# Altium PCB Baseboard-v2.0.PcbDoc (part 1 of 7)
Units mil, origin at the board's own origin, x right, y up, seen from the top; angles counter-clockwise.
Board outline 4488.19 x 3937 mil, 4 copper layers (Top Layer, Ground, Power + Signal, Bottom Layer), stack 61.81 mil thick; 219 components, 194 nets, 891 pads, 449 vias.
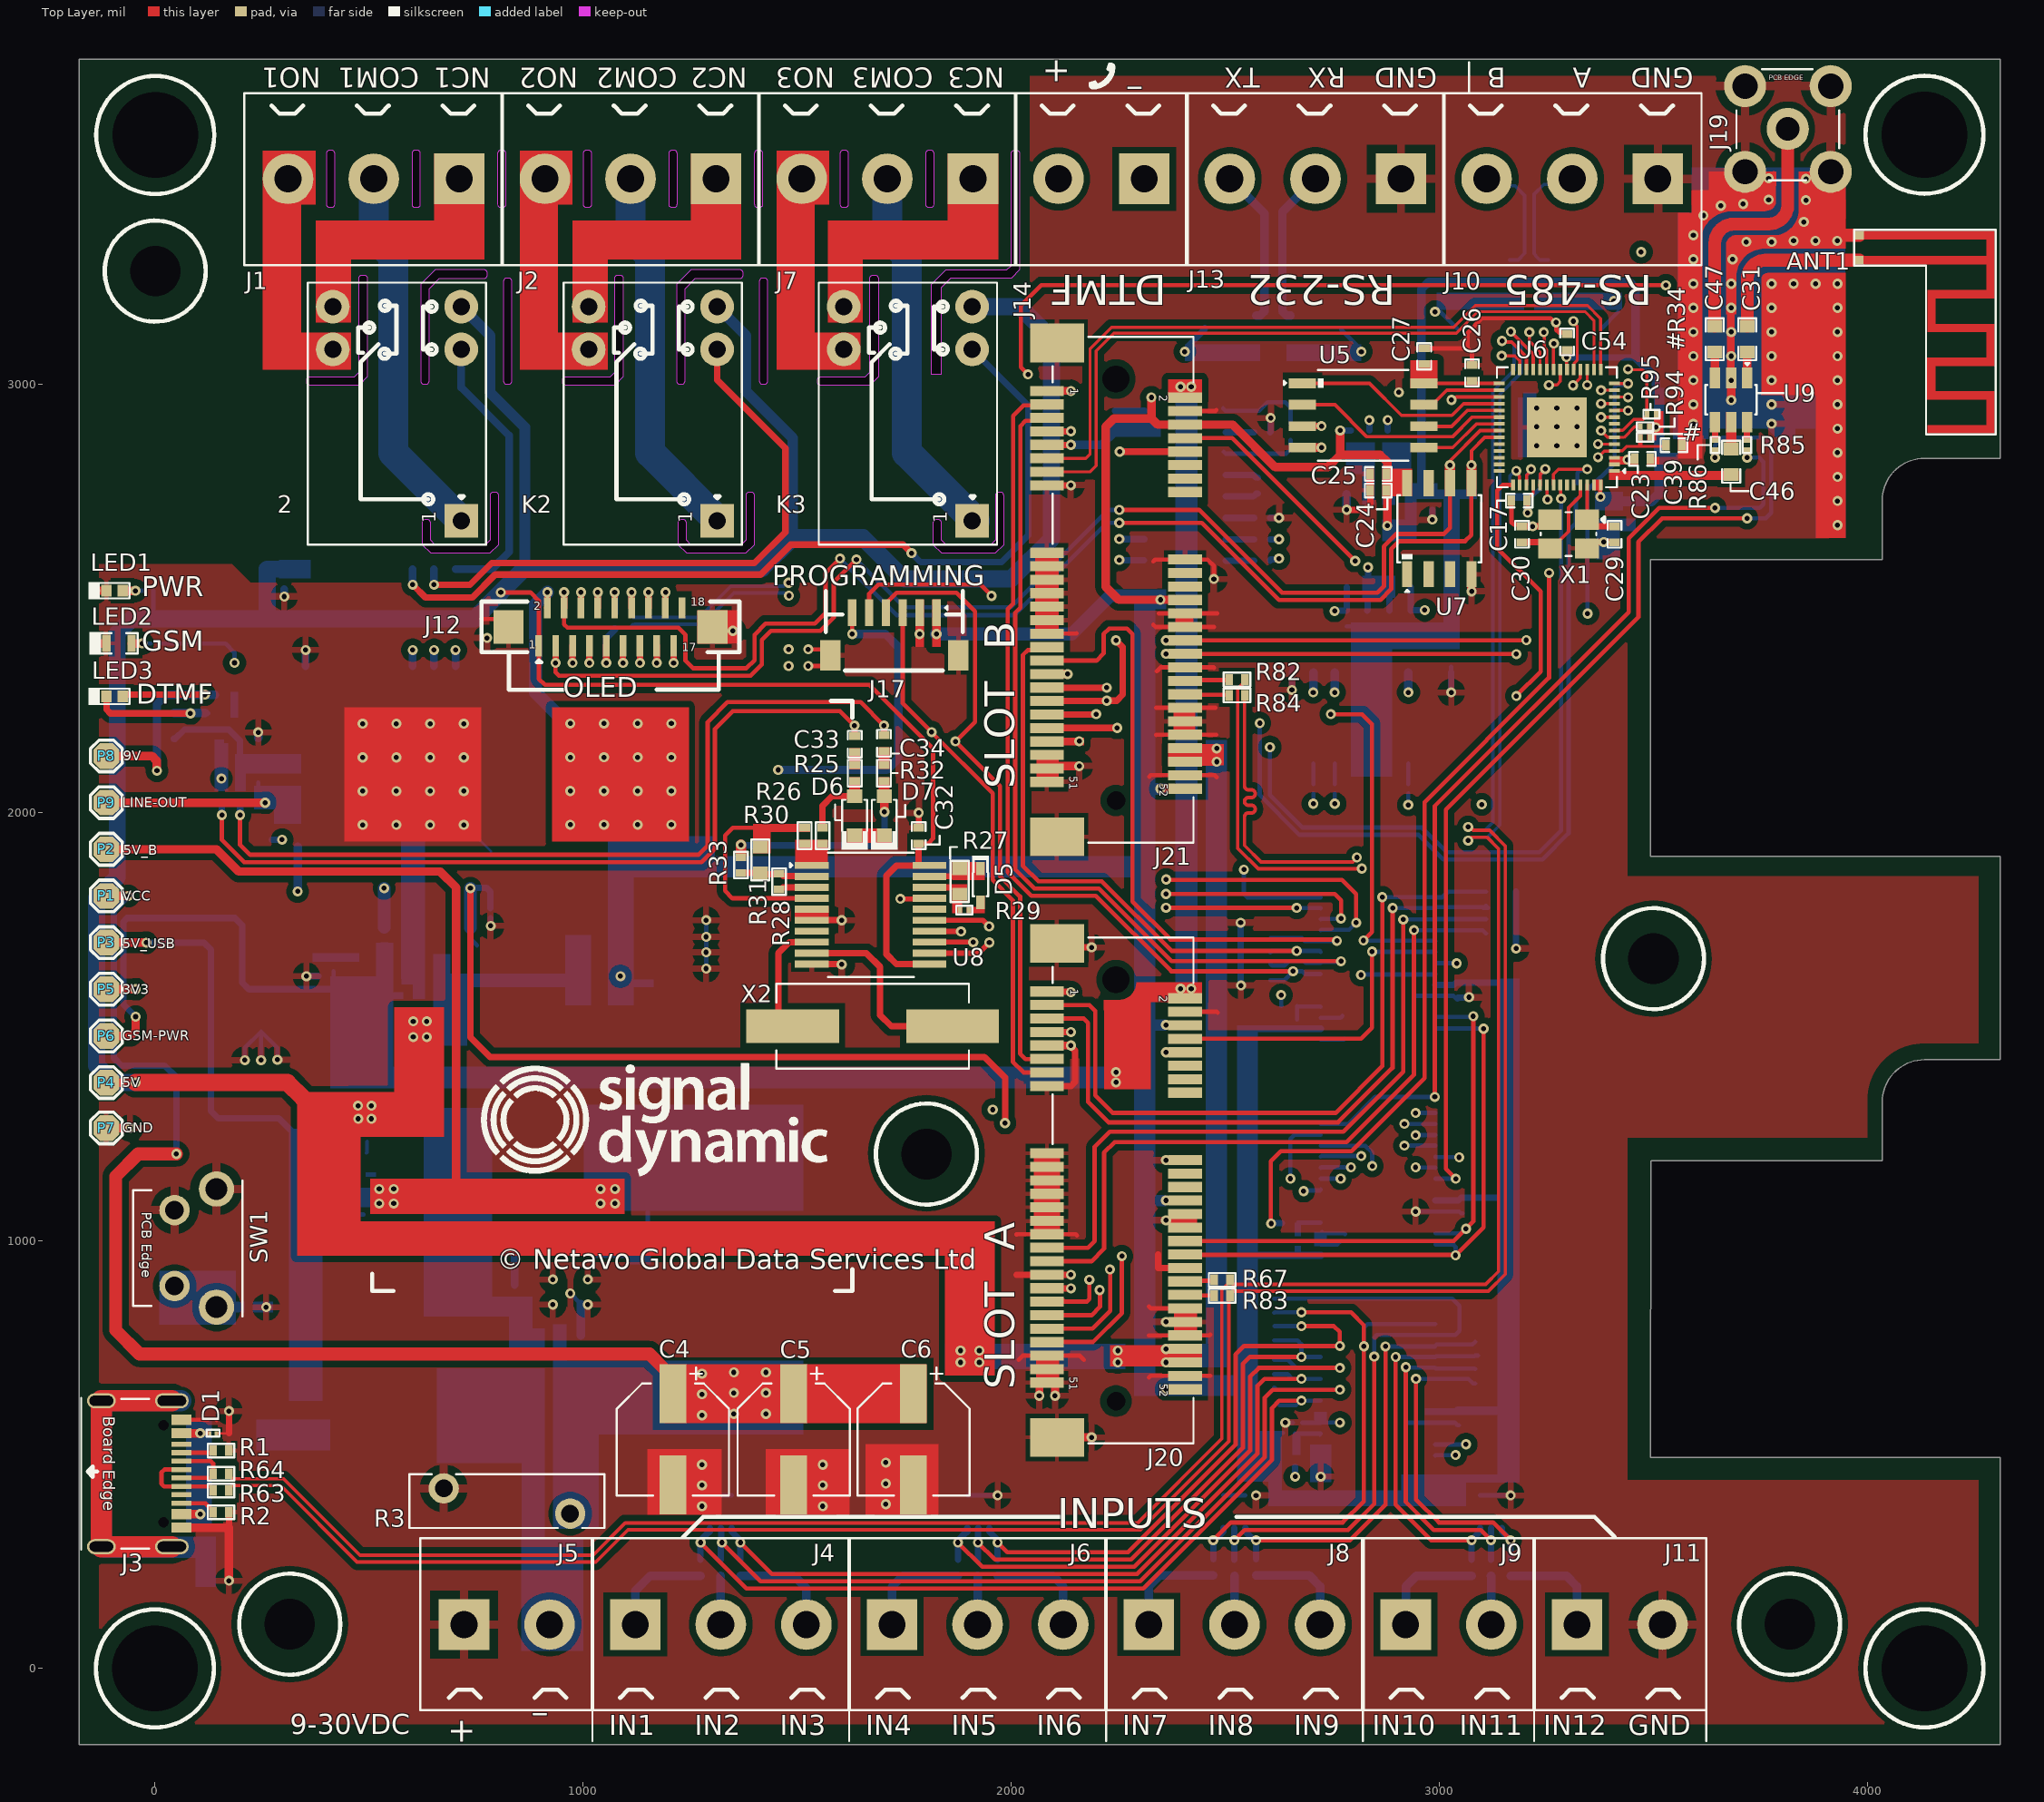
[diagram p0: Top Layer view]
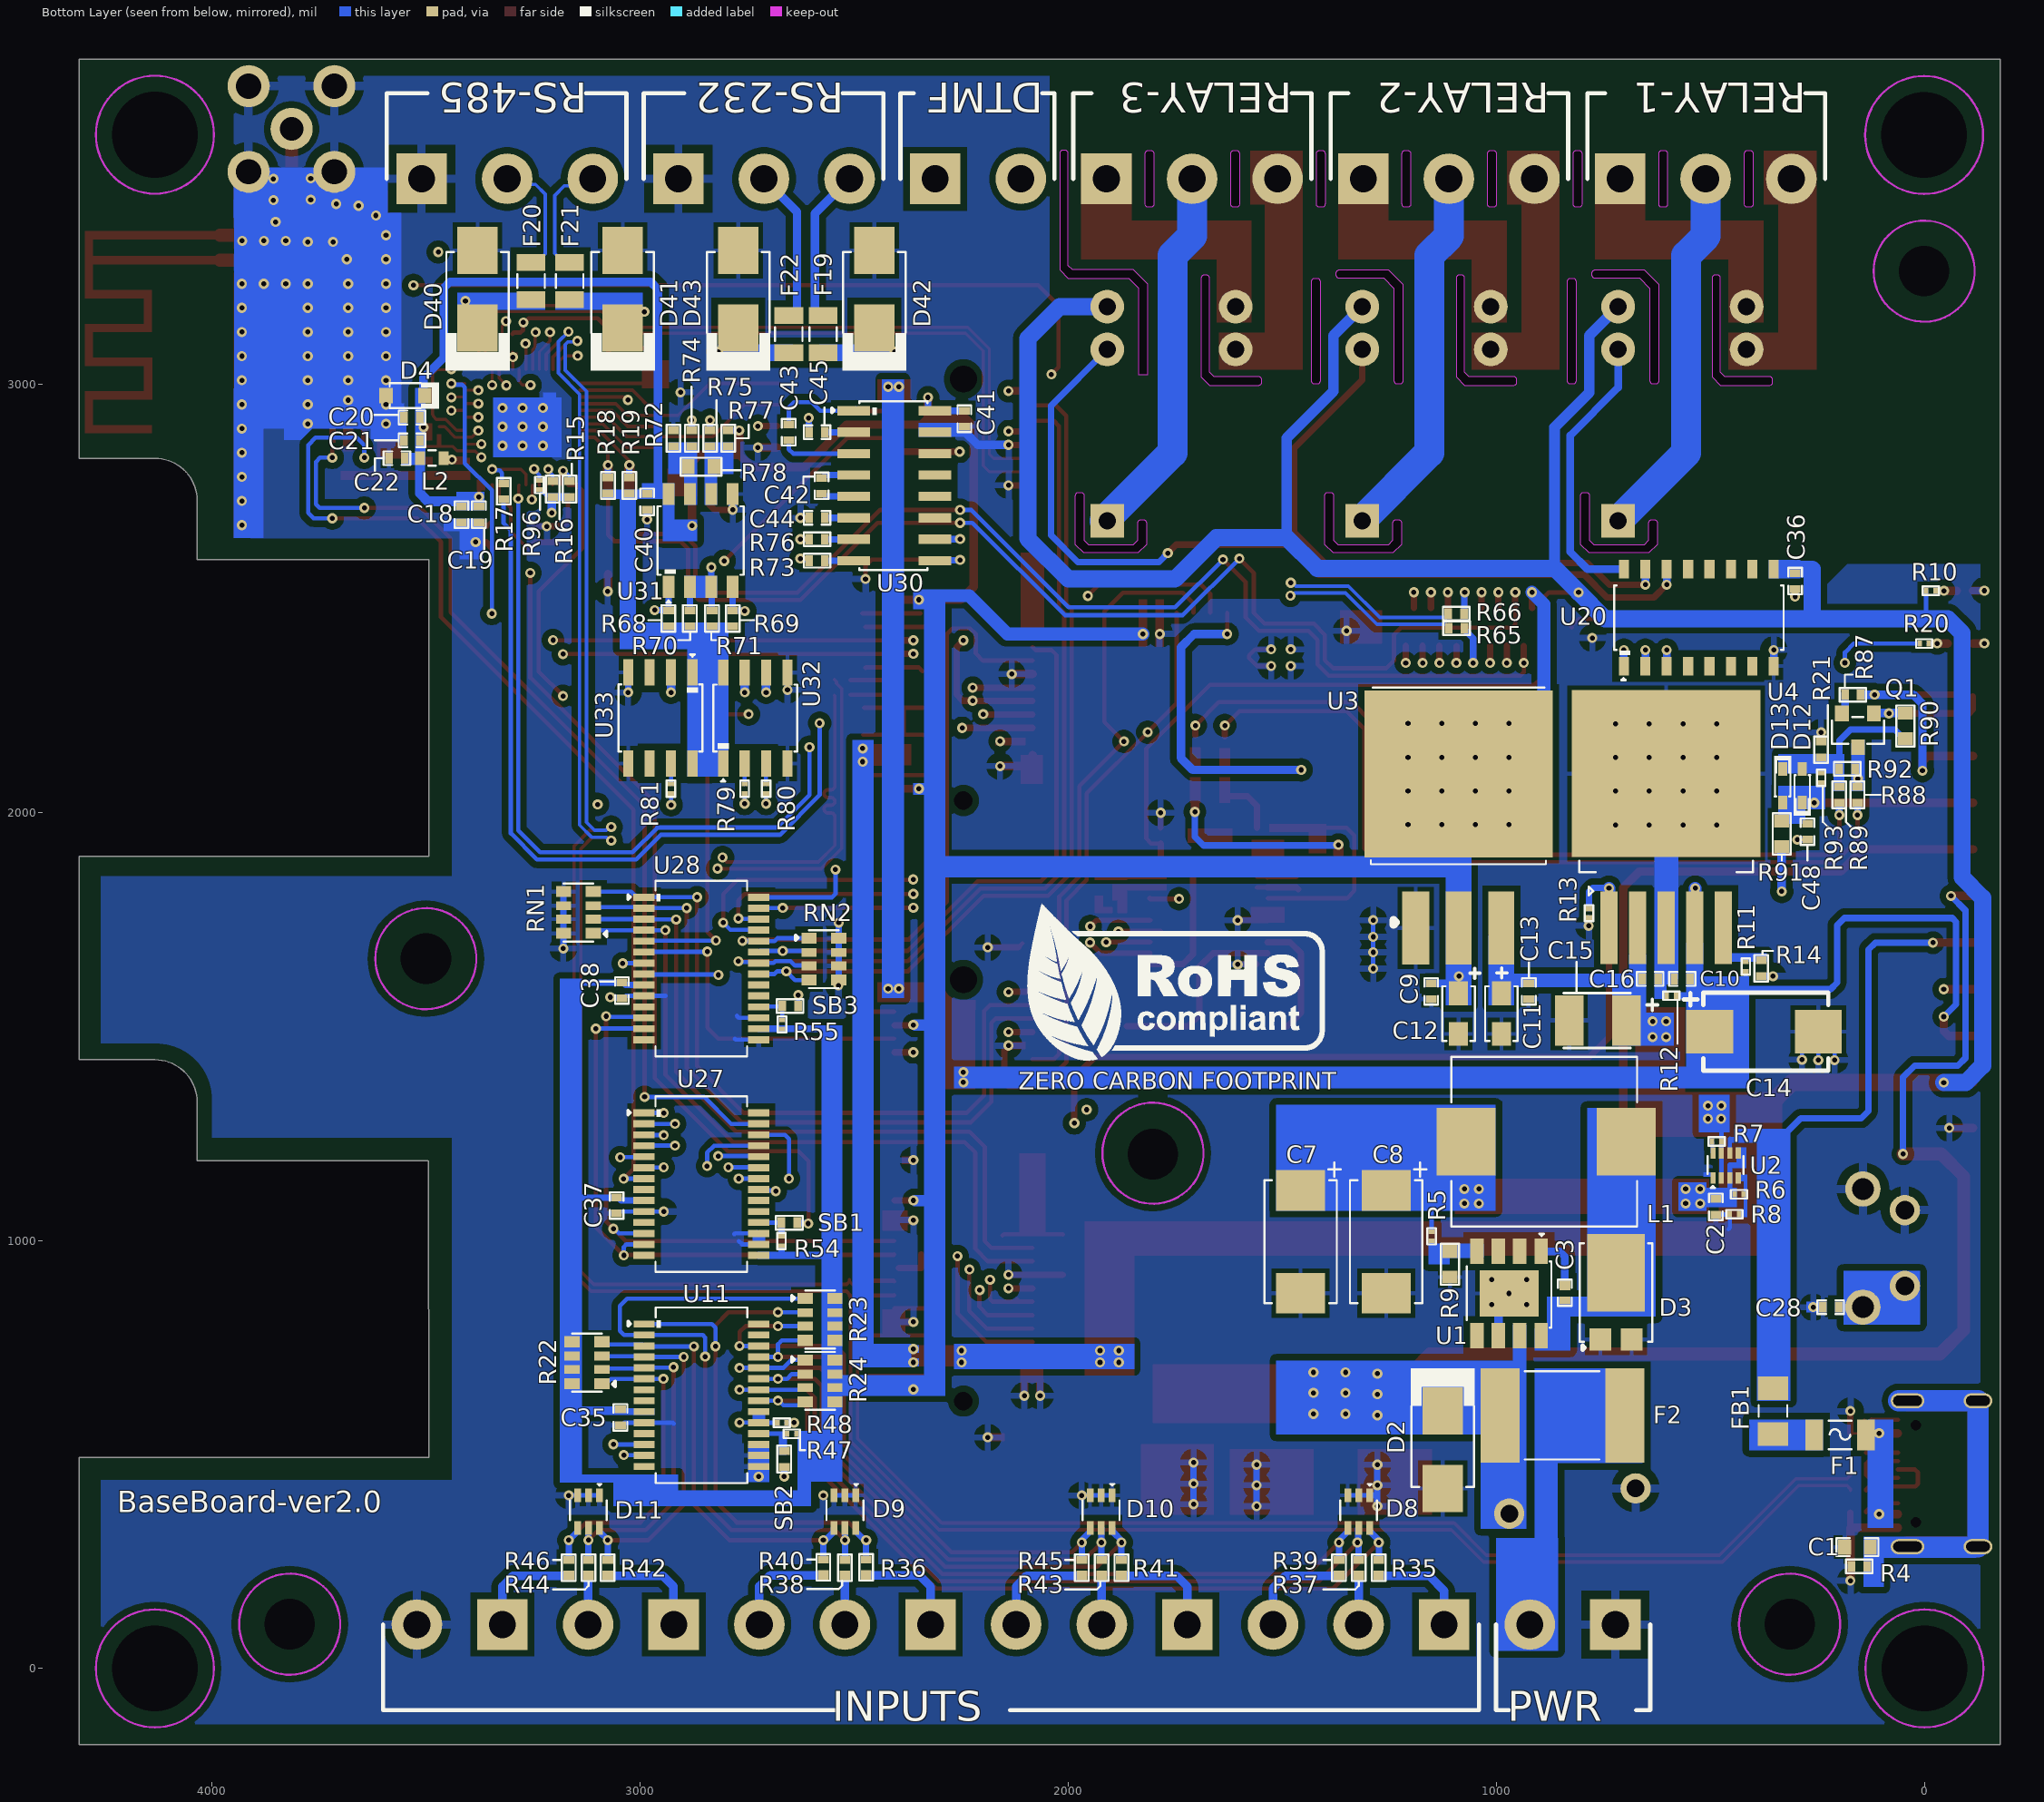
[diagram p1: Bottom Layer view, seen from below]
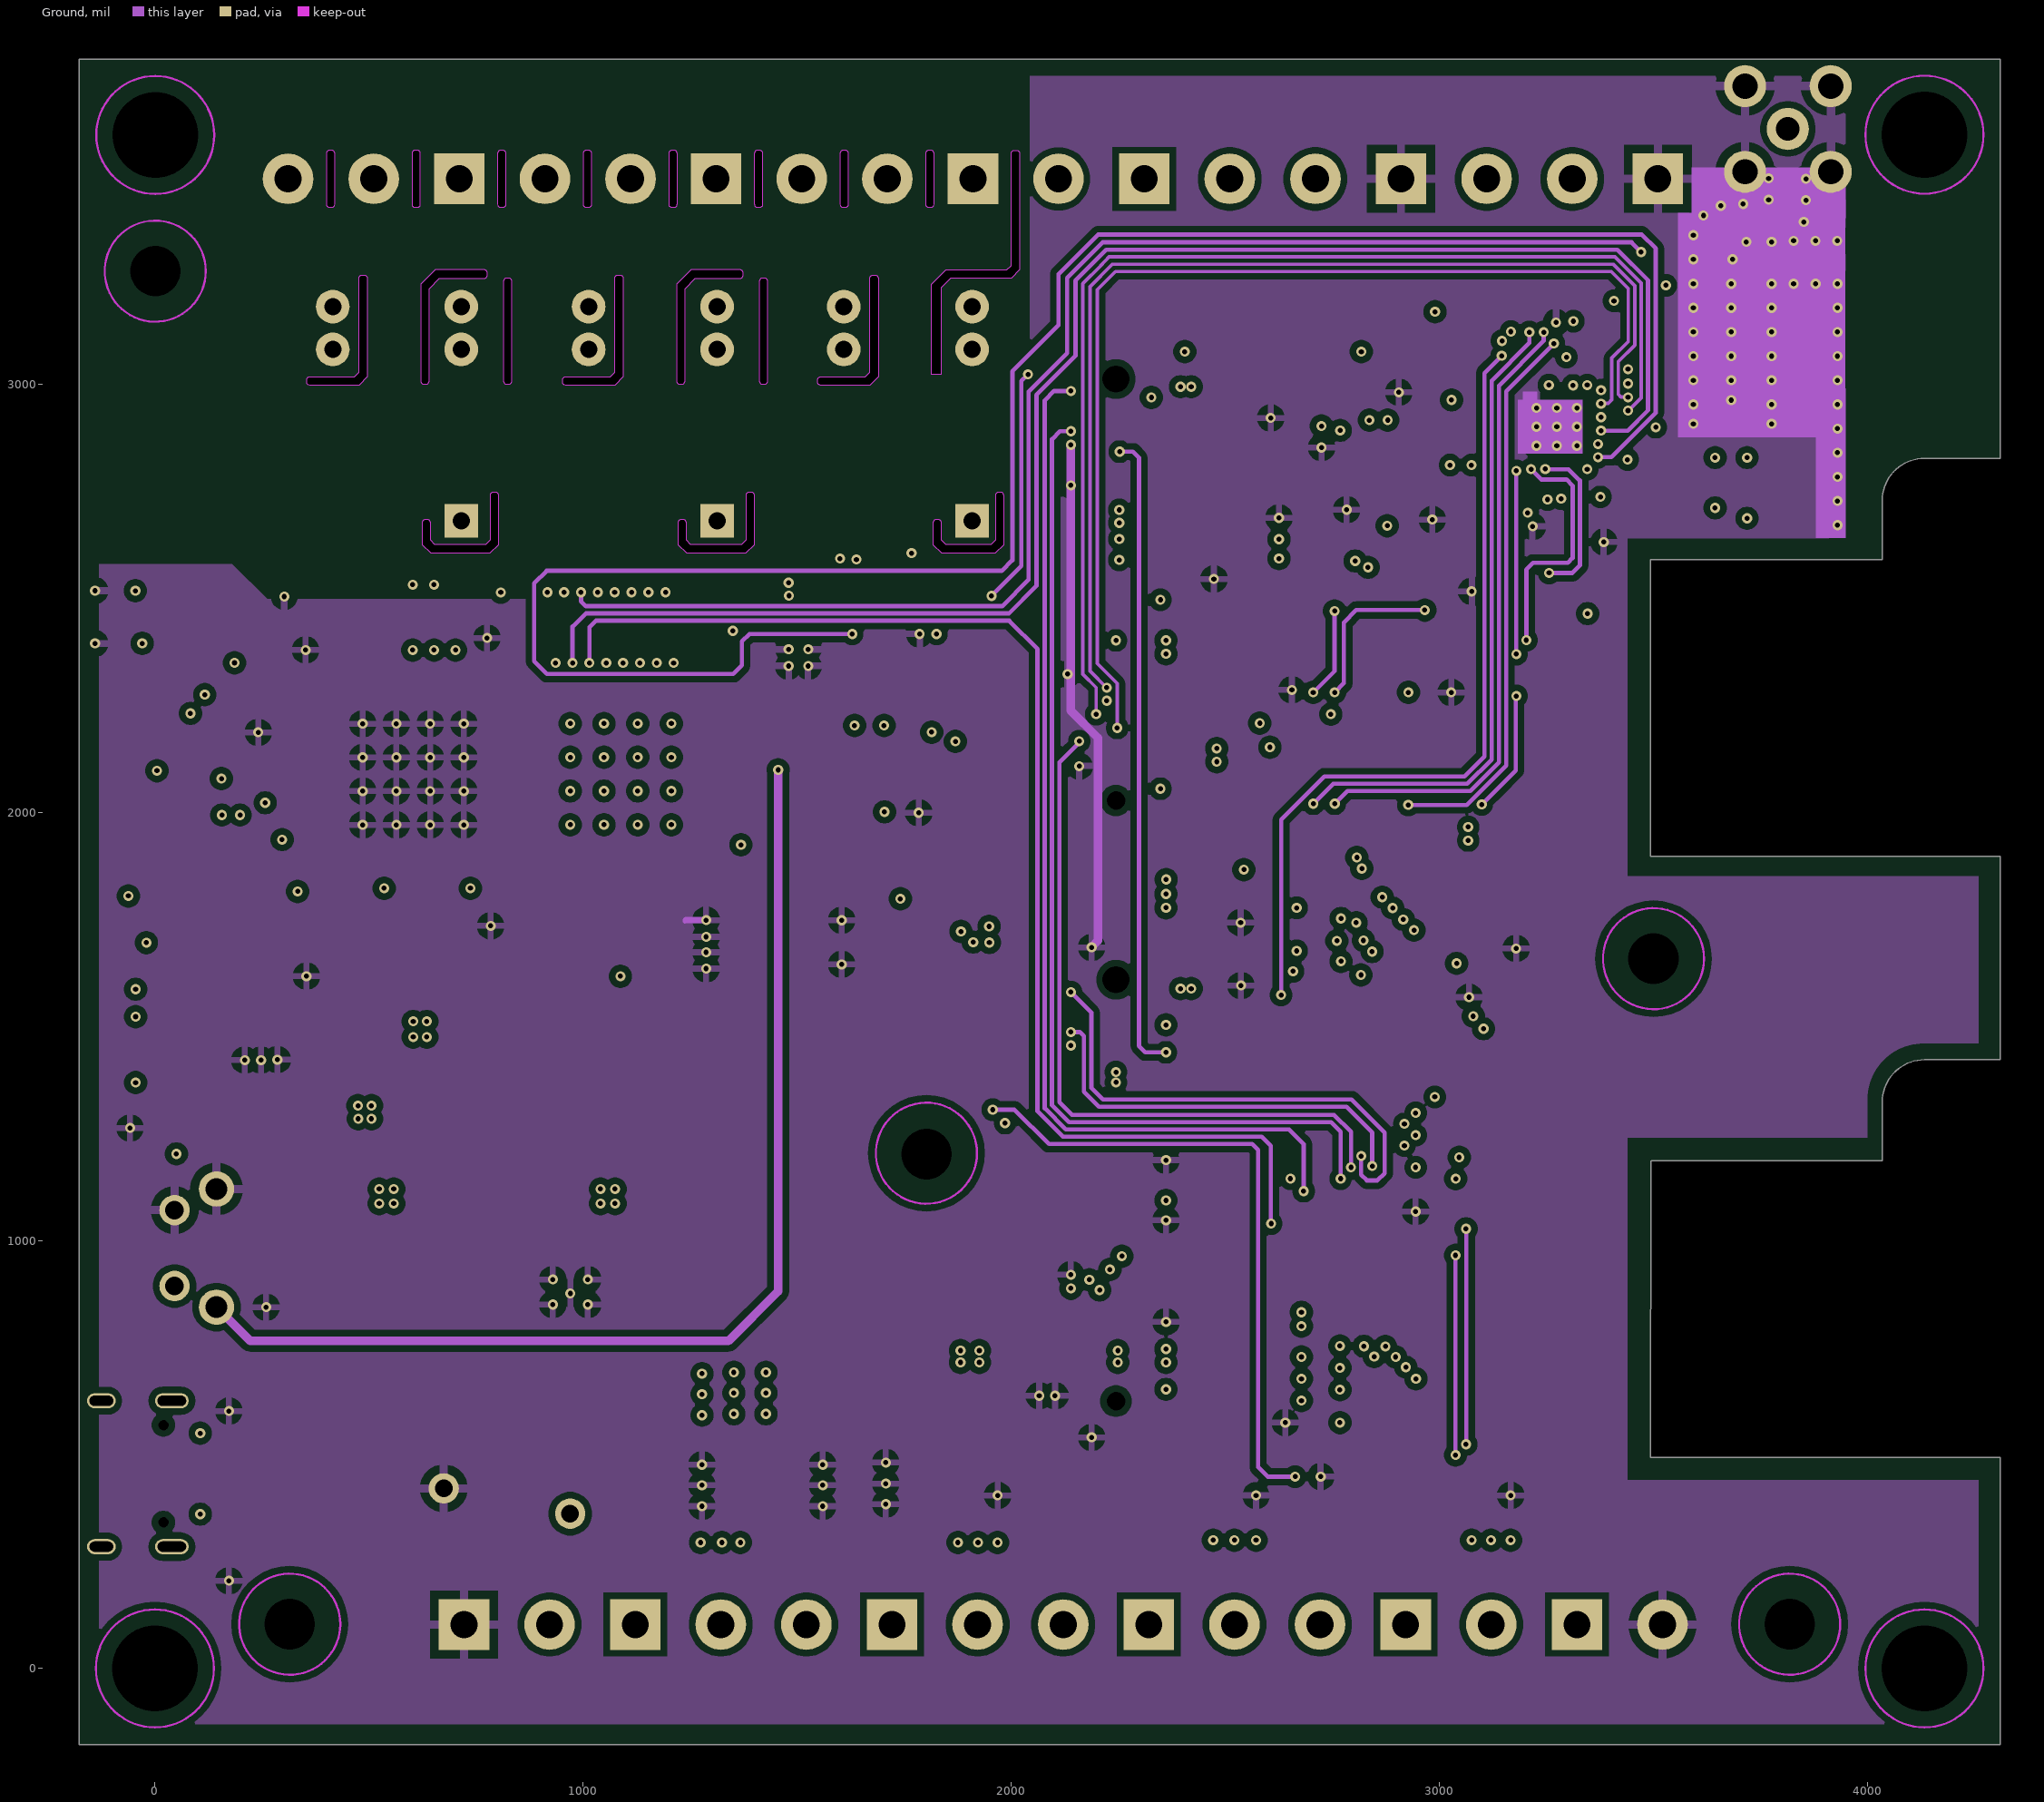
[diagram p2: Ground]
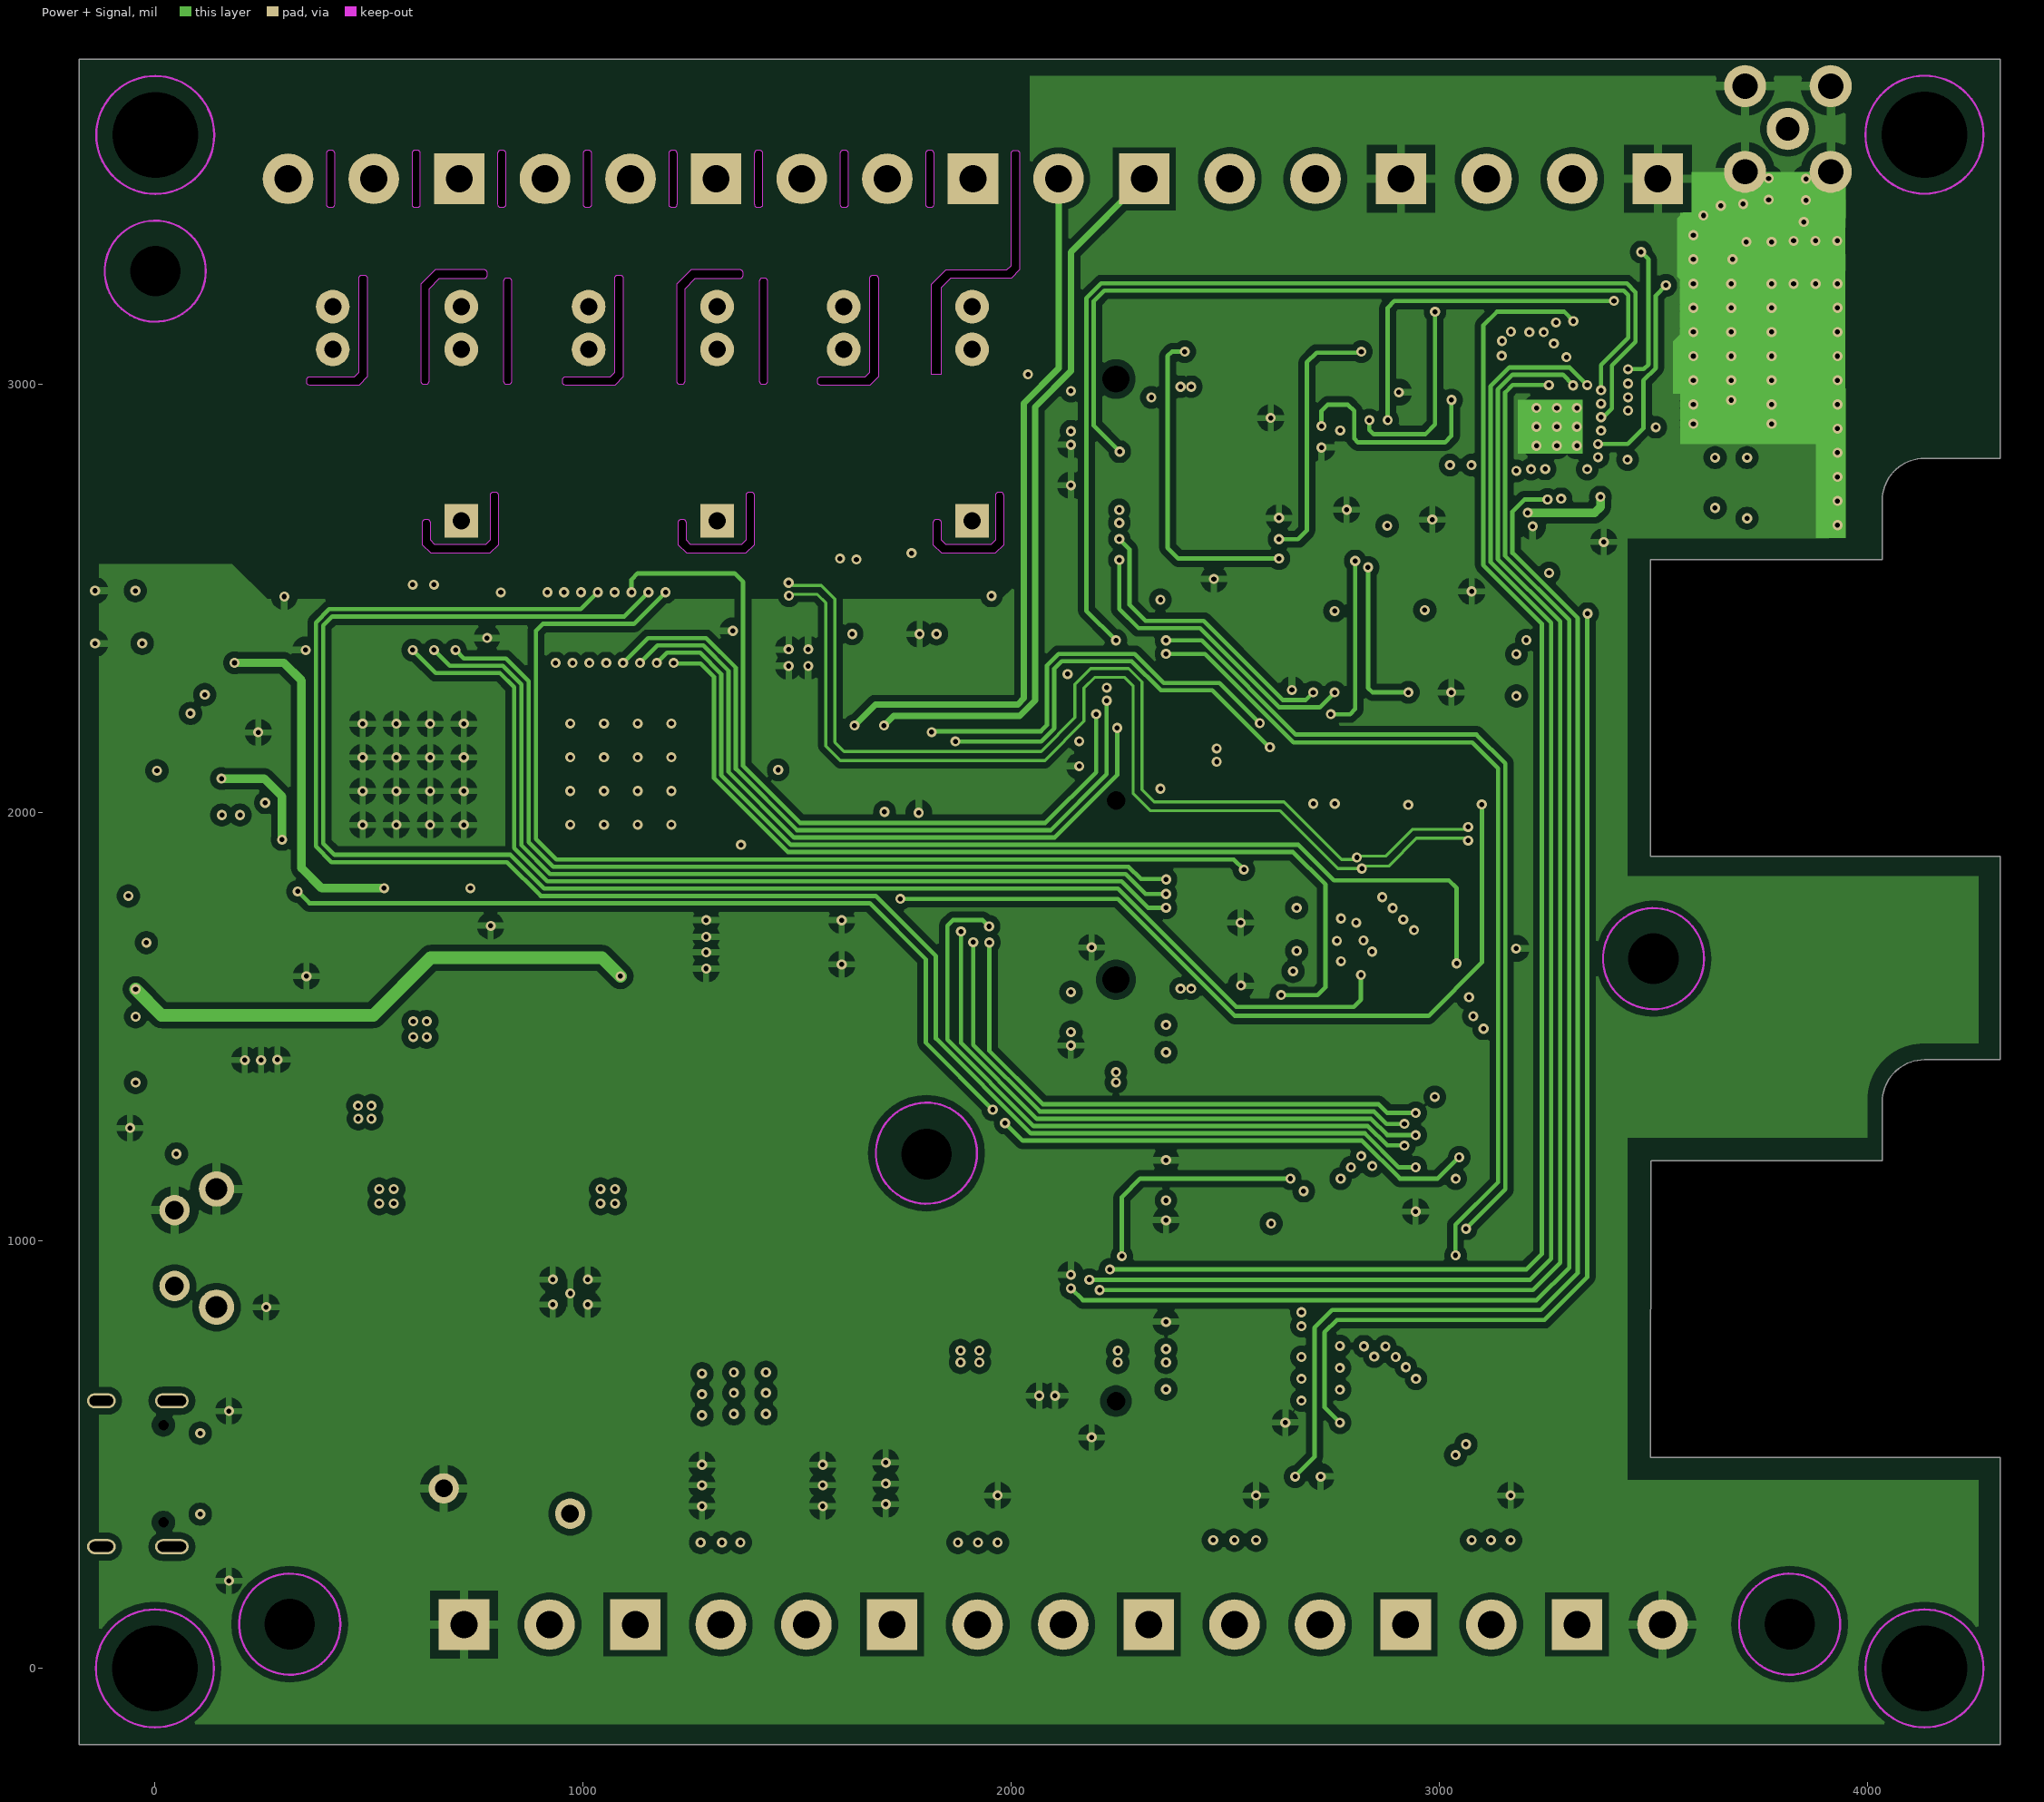
[diagram p3: Power + Signal]
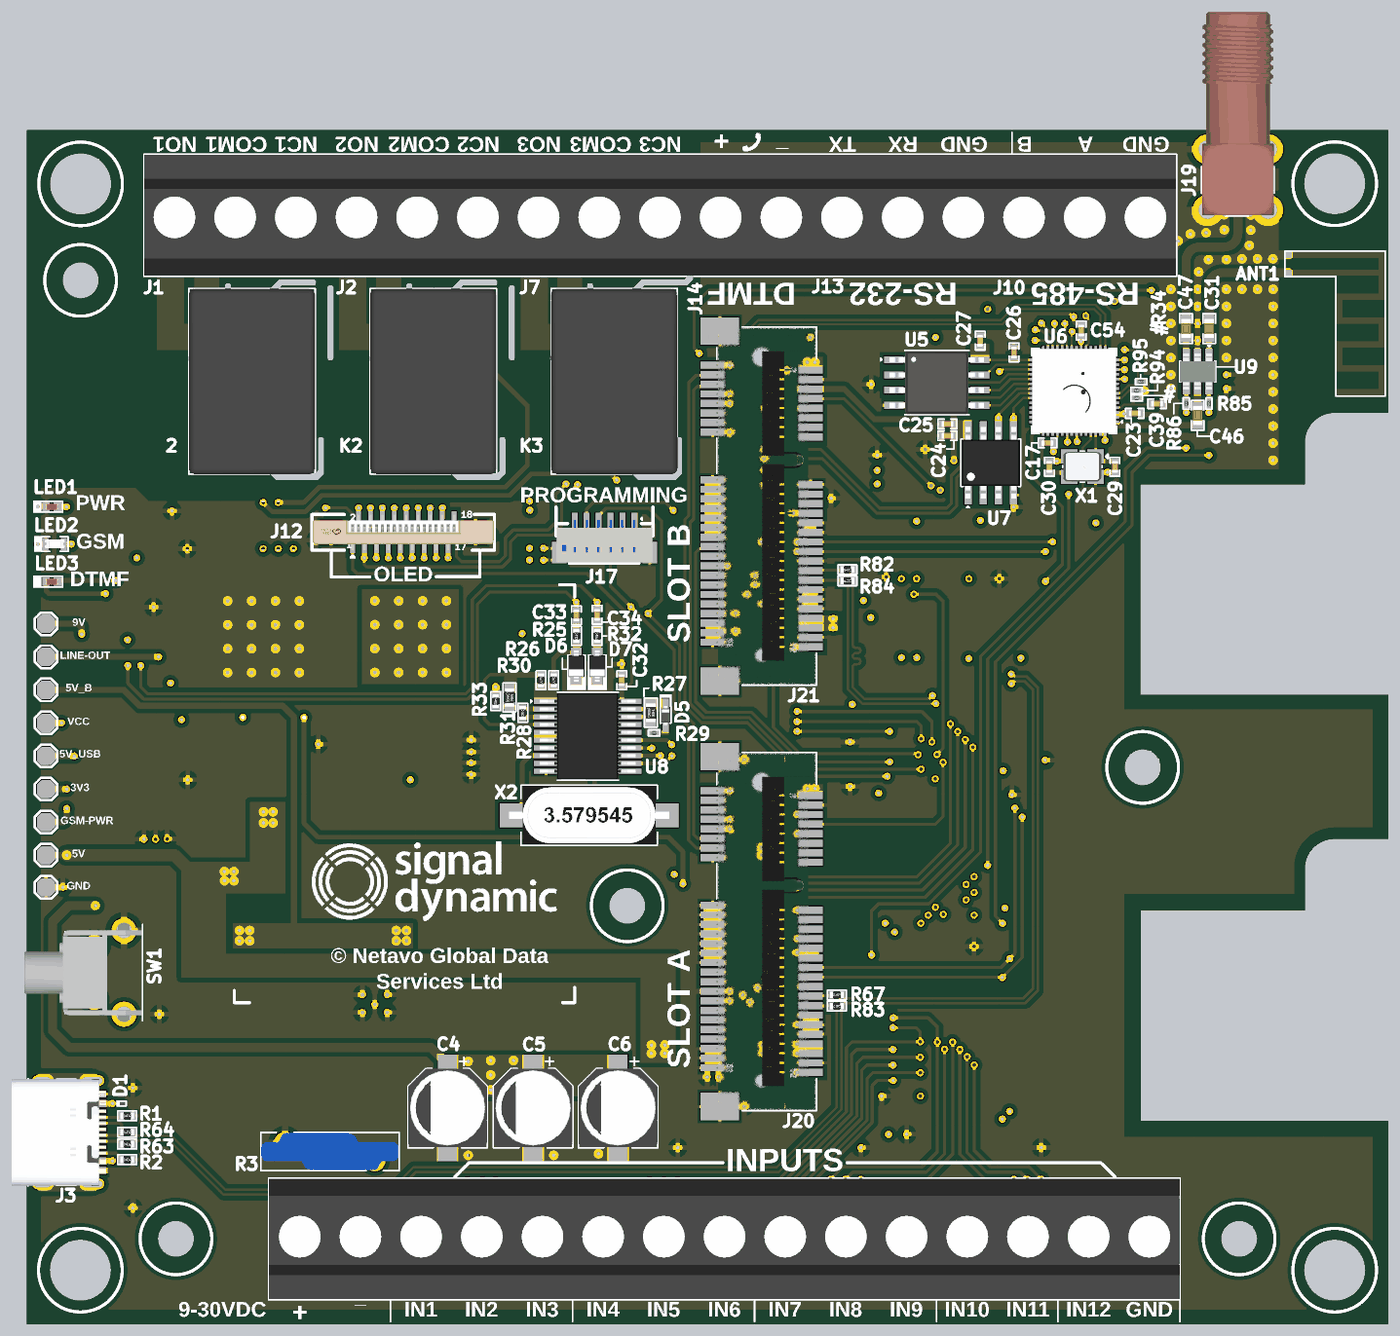
[diagram p7: 3D render of the assembled board from above, using the file's embedded part models]
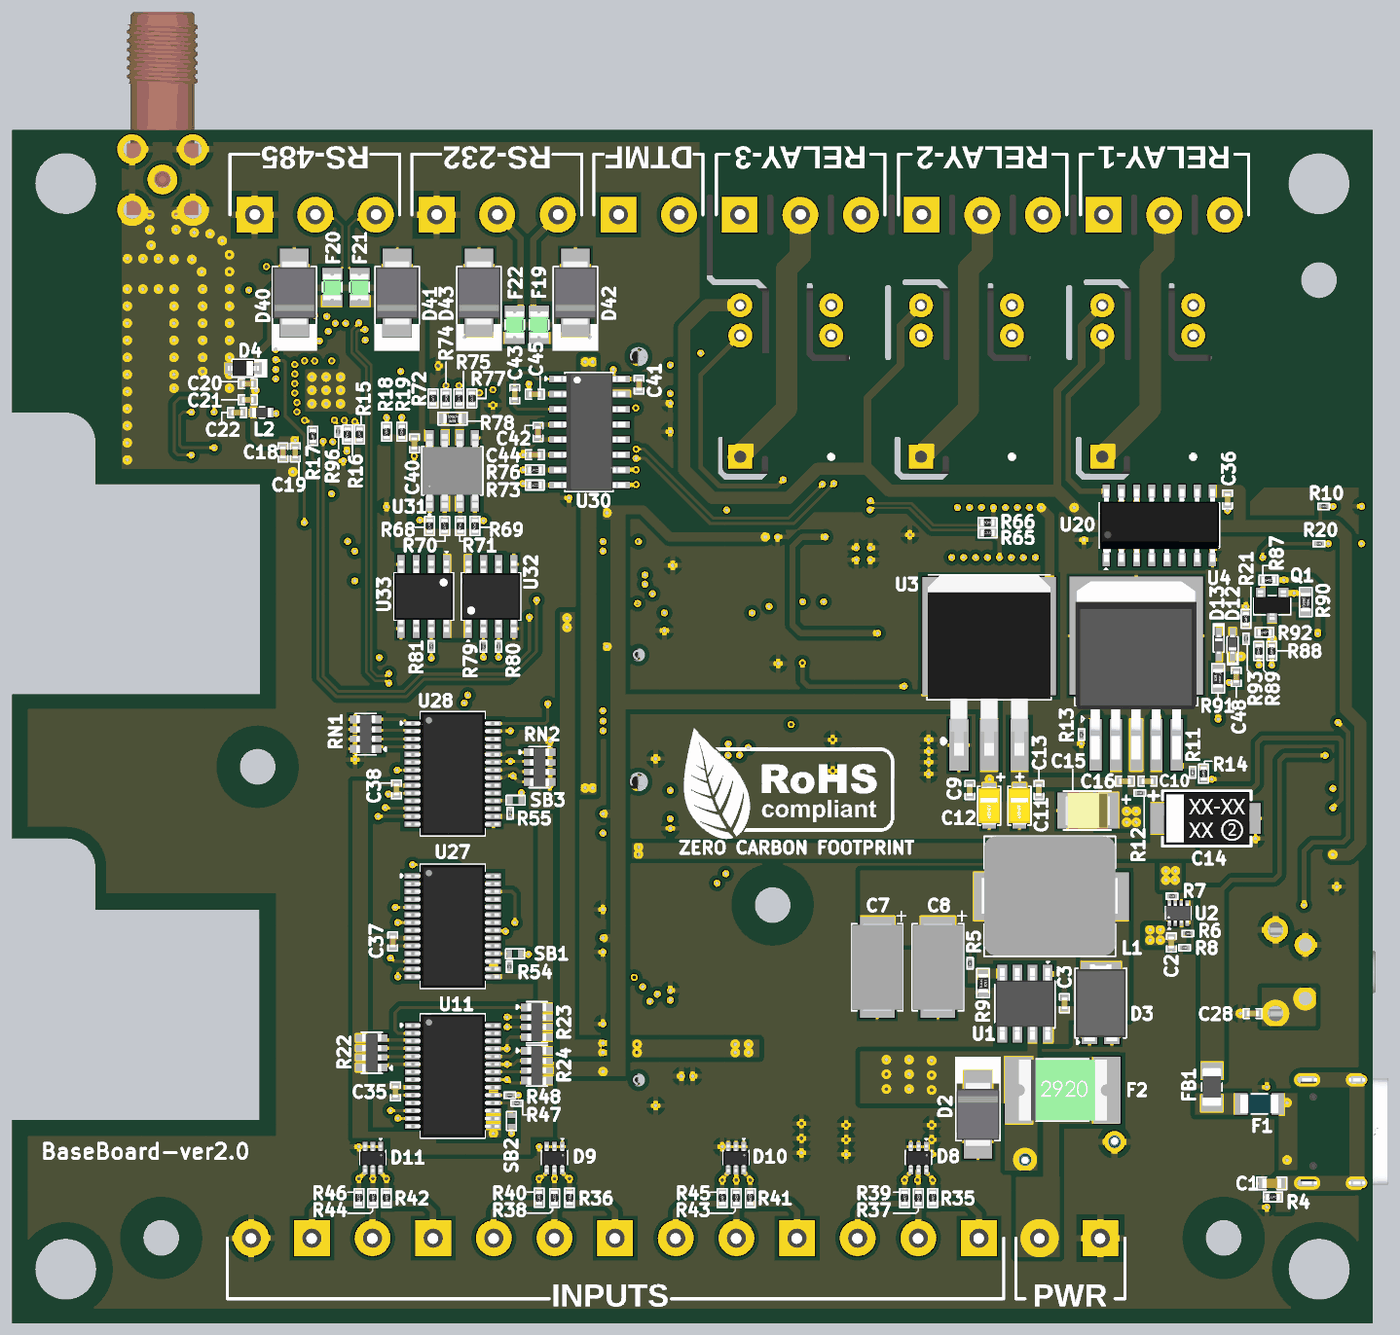
[diagram p8: 3D render of the assembled board from below, using the file's embedded part models]

## Layer stack, top to bottom
Top Solder: solder mask 0.4, Solder Resist, Dk 3.5
Top Layer: signal copper 1.38
Dielectric 2: prepreg 7.87, PP-006, Dk 4.1
Ground: signal copper 1.38
Dielectric 1: core 40.55, FR-4, Dk 4.8
Power + Signal: signal copper 1.38
Dielectric 3: prepreg 7.87, PP-006, Dk 4.1
Bottom Layer: signal copper 1.38
Bottom Solder: solder mask 0.4, Solder Resist, Dk 3.5

## Board outline
3494.34,492.88 3495.08,1184.88 3495.77,1185.58 4035.55,1185.58 4035.55,1323.37 cw(c4133.98,1323.37) 4133.98,1421.79 4311.08,1421.79 4311.08,1896.88 3494.08,1896.88 3494.08,2588.88 3494.14,2590.58 4035.55,2590.58 4035.55,2728.37 cw(c4133.98,2728.37) 4133.98,2826.8 4311.08,2826.8 4311.08,3759.14 -177.11,3759.14 -177.11,-177.86 4311.08,-177.86 4311.08,492.88
cut-out: 1218.6,3007.39 ccw(c1226.02,3007.39) 1226.02,2999.96 1231.17,2999.96 ccw(c1231.17,3007.39) 1238.6,3007.39 1238.6,3223 1262.58,3246.98 1366.7,3246.98 ccw(c1366.7,3254.4) 1374.12,3254.4 1374.12,3259.55 ccw(c1366.7,3259.55) 1366.7,3266.98 1252.21,3266.98 1218.6,3233.36
cut-out: 1411.89,3007.39 ccw(c1419.32,3007.39) 1419.32,2999.96 1424.47,2999.96 ccw(c1424.47,3007.39) 1431.89,3007.39 1431.89,3240.09 ccw(c1424.47,3240.09) 1424.47,3247.52 1419.32,3247.52 ccw(c1419.32,3240.09) 1411.89,3240.09
cut-out: 814.15,3007.39 ccw(c821.58,3007.39) 821.58,2999.96 826.73,2999.96 ccw(c826.73,3007.39) 834.15,3007.39 834.15,3240.09 ccw(c826.73,3240.09) 826.73,3247.52 821.58,3247.52 ccw(c821.58,3240.09) 814.15,3240.09
cut-out: 620.86,3007.39 ccw(c628.28,3007.39) 628.28,2999.96 633.43,2999.96 ccw(c633.43,3007.39) 640.86,3007.39 640.86,3223 664.84,3246.98 768.95,3246.98 ccw(c768.95,3254.4) 776.38,3254.4 776.38,3259.55 ccw(c768.95,3259.55) 768.95,3266.98 654.47,3266.98 620.86,3233.36
cut-out: 1814.6,3023 1814.6,3233.36 1848.21,3266.98 1990,3266.98 1990,3267 2000.37,3277.37 2000.35,3277.37 2000.35,3538.57 cw(c2007.77,3538.57) 2007.77,3546 2012.92,3546 cw(c2012.92,3538.57) 2020.35,3538.57 2020.35,3266.98 2000.37,3247 2000.35,3246.98 1858.58,3246.98 1836.51,3224.91 1836.51,3023 1836.49,3022.98
cut-out: 1817.68,2625.62 1837.54,2605.75 1963.68,2605.75 1983.33,2625.4 1983.33,2739.89 ccw(c1975.91,2739.89) 1975.91,2747.31 1970.76,2747.31 ccw(c1970.76,2739.89) 1963.33,2739.89 1963.33,2635.98 1952.97,2625.62 1848.04,2625.62 1837.68,2635.98 1837.68,2676.09 ccw(c1830.25,2676.09) 1830.25,2683.52 1825.1,2683.52 ccw(c1825.1,2676.09) 1817.68,2676.09
cut-out: 1221.68,2625.62 1241.54,2605.75 1380.83,2605.75 1380.87,2605.71 1400.74,2625.58 1400.74,2740.06 ccw(c1393.32,2740.06) 1393.32,2747.48 1388.17,2747.48 ccw(c1388.17,2740.06) 1380.74,2740.06 1380.74,2635.94 1370.37,2625.58 1370.33,2625.62 1252.04,2625.62 1241.68,2635.98 1241.68,2676.09 ccw(c1234.25,2676.09) 1234.25,2683.52 1229.1,2683.52 ccw(c1229.1,2676.09) 1221.68,2676.09
cut-out: 623.94,2625.62 643.8,2605.75 783.09,2605.75 783.13,2605.71 803,2625.58 803,2740.06 ccw(c795.57,2740.06) 795.57,2747.48 790.43,2747.48 ccw(c790.43,2740.06) 783,2740.06 783,2635.94 772.63,2625.58 772.59,2625.62 654.3,2625.62 643.94,2635.98 643.94,2676.09 ccw(c636.51,2676.09) 636.51,2683.52 631.36,2683.52 ccw(c631.36,2676.09) 623.94,2676.09
cut-out: 1548.3,3004.8 1548.3,3009.94 cw(c1555.73,3009.94) 1555.73,3017.37 1659.85,3017.37 1670.21,3027.74 1670.21,3247.11 1670.08,3247.11 cw(c1677.5,3247.11) 1677.5,3254.54 1682.65,3254.54 cw(c1682.65,3247.11) 1690.08,3247.11 1690.08,3017.24 1670.21,2997.37 1555.73,2997.37 cw(c1555.73,3004.8)
cut-out: 952.3,3004.8 952.3,3009.94 cw(c959.73,3009.94) 959.73,3017.37 1063.85,3017.37 1074.21,3027.74 1074.21,3247.11 1074.08,3247.11 cw(c1081.5,3247.11) 1081.5,3254.54 1086.65,3254.54 cw(c1086.65,3247.11) 1094.08,3247.11 1094.08,3017.24 1074.21,2997.37 959.73,2997.37 cw(c959.73,3004.8)
cut-out: 354.56,3004.8 354.56,3009.94 cw(c361.99,3009.94) 361.99,3017.37 466.11,3017.37 476.47,3027.74 476.47,3247.11 476.34,3247.11 cw(c483.76,3247.11) 483.76,3254.54 488.91,3254.54 cw(c488.91,3247.11) 496.34,3247.11 496.34,3017.24 476.47,2997.37 361.99,2997.37 cw(c361.99,3004.8)
cut-out: 1800.35,3420.57 ccw(c1807.77,3420.57) 1807.77,3413.15 1812.92,3413.15 ccw(c1812.92,3420.57) 1820.35,3420.57 1820.35,3538.57 ccw(c1812.92,3538.57) 1812.92,3546 1807.77,3546 ccw(c1807.77,3538.57) 1800.35,3538.57
cut-out: 1600.35,3420.57 ccw(c1607.77,3420.57) 1607.77,3413.15 1612.92,3413.15 ccw(c1612.92,3420.57) 1620.35,3420.57 1620.35,3538.57 ccw(c1612.92,3538.57) 1612.92,3546 1607.77,3546 ccw(c1607.77,3538.57) 1600.35,3538.57
cut-out: 1400.35,3420.57 ccw(c1407.77,3420.57) 1407.77,3413.15 1412.92,3413.15 ccw(c1412.92,3420.57) 1420.35,3420.57 1420.35,3538.57 ccw(c1412.92,3538.57) 1412.92,3546 1407.77,3546 ccw(c1407.77,3538.57) 1400.35,3538.57
cut-out: 1200.35,3420.57 ccw(c1207.77,3420.57) 1207.77,3413.15 1212.92,3413.15 ccw(c1212.92,3420.57) 1220.35,3420.57 1220.35,3538.57 ccw(c1212.92,3538.57) 1212.92,3546 1207.77,3546 ccw(c1207.77,3538.57) 1200.35,3538.57
cut-out: 1000.35,3420.57 ccw(c1007.77,3420.57) 1007.77,3413.15 1012.92,3413.15 ccw(c1012.92,3420.57) 1020.35,3420.57 1020.35,3538.57 ccw(c1012.92,3538.57) 1012.92,3546 1007.77,3546 ccw(c1007.77,3538.57) 1000.35,3538.57
cut-out: 800.35,3420.57 ccw(c807.77,3420.57) 807.77,3413.15 812.92,3413.15 ccw(c812.92,3420.57) 820.35,3420.57 820.35,3538.57 ccw(c812.92,3538.57) 812.92,3546 807.77,3546 ccw(c807.77,3538.57) 800.35,3538.57
cut-out: 600.35,3420.57 ccw(c607.77,3420.57) 607.77,3413.15 612.92,3413.15 ccw(c612.92,3420.57) 620.35,3420.57 620.35,3538.57 ccw(c612.92,3538.57) 612.92,3546 607.77,3546 ccw(c607.77,3538.57) 600.35,3538.57
cut-out: 400.35,3420.57 ccw(c407.77,3420.57) 407.77,3413.15 412.92,3413.15 ccw(c412.92,3420.57) 420.35,3420.57 420.35,3538.57 ccw(c412.92,3538.57) 412.92,3546 407.77,3546 ccw(c407.77,3538.57) 400.35,3538.57

## Design rules (kind name [scope] priority, off if disabled: settings)
Clearance Clearance_INNER2 [OnLayer('Power + Signal')] p1: gap=15 ignorepadtopadclearanceinfootprint=FALSE except(0: Arc-Hole Track-Hole SMDPad-Hole THPad-Hole Via-Hole Fill-Hole Poly-Hole Region-Hole Text-Hole; 4: Arc-SMDPad Track-SMDPad SMDPad-SMDPad; 5: SMDPad-THPad; 7: Arc-Arc Arc-Track Arc-THPad Arc-Via Arc-Text Track-Track Track-THPad Track-Via Track-Text SMDPad-Via SMDPad-Text THPad-THPad THPad-Via THPad-Text Via-Via Via-Text Fill-Text Poly-Text Region-Text Text-Text)
Clearance Clearance_BOTTOM [OnLayer('Bottom Layer')] p2: gap=7 ignorepadtopadclearanceinfootprint=FALSE except(0: Arc-Hole Track-Hole SMDPad-Hole THPad-Hole Via-Hole Fill-Hole Poly-Hole Region-Hole Text-Hole; 4: Arc-SMDPad Track-SMDPad SMDPad-SMDPad; 5: SMDPad-THPad; 8: SMDPad-Fill; 10: Arc-Fill Arc-Region Track-Fill Track-Region SMDPad-Region THPad-Fill THPad-Region Via-Fill Via-Region Fill-Fill Fill-Region Poly-Region Region-Region; 15: Arc-Poly Track-Poly SMDPad-Poly THPad-Poly Via-Poly Fill-Poly Poly-Poly)
Clearance Clearance_TOP [OnLayer('Top Layer')] p3: gap=7 ignorepadtopadclearanceinfootprint=FALSE except(0: Arc-Hole Track-Hole SMDPad-Hole THPad-Hole Via-Hole Fill-Hole Poly-Hole Region-Hole Text-Hole; 4: Arc-SMDPad Track-SMDPad SMDPad-SMDPad; 5: SMDPad-THPad; 10: Arc-Fill Arc-Region Track-Fill Track-Region SMDPad-Fill THPad-Fill Via-Fill Fill-Fill; 15: Arc-Poly Track-Poly SMDPad-Poly SMDPad-Region THPad-Poly THPad-Region Via-Poly Via-Region Fill-Poly Fill-Region Poly-Poly Poly-Region Region-Region)
Clearance Clearance_INNER1 [OnLayer('Ground')] p4: gap=15 ignorepadtopadclearanceinfootprint=FALSE except(0: Arc-Hole Track-Hole SMDPad-Hole THPad-Hole Via-Hole Fill-Hole Poly-Hole Region-Hole Text-Hole; 4: Arc-SMDPad Track-SMDPad SMDPad-SMDPad; 5: SMDPad-THPad; 7: Arc-Arc Arc-Track Arc-THPad Arc-Via Arc-Text Track-Track Track-THPad Track-Via Track-Text SMDPad-Via SMDPad-Text THPad-THPad THPad-Via THPad-Text Via-Via Via-Text Fill-Text Poly-Text Region-Text Text-Text)
ComponentClearance [All] p1: gap=0 collisioncheckmode=3 verticalgap=0 showdistances=FALSE
DiffPairsRouting DiffPairsRouting_USB [InDifferentialPairClass('USB_DIFF_Lines')] p1: maxlimit=14 minlimit=8 mostfreqgap=14 toplayer_maxgap=8 toplayer_prefgap=8 toplayer_minwidth=8 toplayer_maxwidth=8 toplayer_prefwidth=8 midlayer1_mingap=14 midlayer1_minwidth=7 midlayer1_maxwidth=7 midlayer1_prefwidth=7 midlayer2_mingap=14 midlayer2_minwidth=7 midlayer2_maxwidth=7 midlayer2_prefwidth=7 bottomlayer_maxgap=8 bottomlayer_prefgap=8 bottomlayer_minwidth=8 bottomlayer_maxwidth=8 bottomlayer_prefwidth=8 impedanceprofiledriven=TRUE impedanceprofileid={85958C19-3E4E-46A3-A006-A09392C5658B} impedanceprofilevalue=100.000000 maxuncoupledlength=500
DiffPairsRouting DiffPairsRouting_RS485 [InDifferentialPairClass('RS485_LINES')] p2: maxlimit=15 minlimit=14 mostfreqgap=15 toplayer_maxgap=14 toplayer_prefgap=14 toplayer_minwidth=8 toplayer_maxwidth=8 toplayer_prefwidth=8 midlayer1_mingap=15 midlayer1_minwidth=6 midlayer1_maxwidth=6 midlayer1_prefwidth=6 midlayer2_mingap=15 midlayer2_minwidth=6 midlayer2_maxwidth=6 midlayer2_prefwidth=6 bottomlayer_maxgap=14 bottomlayer_prefgap=14 bottomlayer_minwidth=8 bottomlayer_maxwidth=8 bottomlayer_prefwidth=8 impedanceprofiledriven=TRUE impedanceprofileid={28539E45-AA73-4C0F-8FDC-7AA2D51AC4ED} impedanceprofilevalue=120.000000 maxuncoupledlength=500
HoleSize [All] p1: absolutevalues=TRUE maxlimit=1000 minlimit=1 maxpercent=80.000 minpercent=20.000
HoleToHoleClearance [All] p1: gap=5 allowstackedmicrovias=TRUE
MatchedLengths "Schematic Matched Net Lengths_1" [InNetClass('USB_DIFF')] p1: tolerance=20 checknetsindiffpair=TRUE checkdiffpairvsdiffpair=FALSE checkxsignals=FALSE checkothers=FALSE
MatchedLengths "Schematic Matched Net Lengths" [InNetClass('RS485')] p2: tolerance=20 checknetsindiffpair=TRUE checkdiffpairvsdiffpair=FALSE checkxsignals=FALSE checkothers=FALSE
MaxMinImpedance "Schematic Impedance Constraint_1" [InNetClass('USB_DIFF')] p1: minimum=85.00 maximum=95.00
MaxMinImpedance "Schematic Impedance Constraint" [InNetClass('RS485')] p2: minimum=115.0 maximum=120.0
MinimumSolderMaskSliver [All] p1: minsoldermaskwidth=0
PolygonConnect [All] p1: thpad.connectstyle=Relief thpad.reliefconductorwidth=20 thpad.reliefentries=4 thpad.polygonreliefangle="90 Angle" thpad.airgapwidth=20 smdpad.connectstyle=Relief smdpad.reliefconductorwidth=10 smdpad.reliefentries=4 smdpad.polygonreliefangle="90 Angle" smdpad.airgapwidth=10 via.connectstyle=Relief via.reliefconductorwidth=15 via.reliefentries=4 via.polygonreliefangle="90 Angle" via.airgapwidth=20
RoutingVias [All] p1: holewidth=11.81 width=23.62 viastyle="Through Hole" minholewidth=11.81 minwidth=23.62 maxholewidth=11.81 maxwidth=23.62
SilkToSilkClearance [All] p1: silktosilkclearance=0
SilkToSolderMaskClearance [IsPad] p1: minsilkscreentomaskgap=0 clearancetoexposedcopper=TRUE
SolderMaskExpansion [All] p1: expansion=4 istentingtop=FALSE
Width [All] p1: maxlimit=100 minlimit=5 preferedwidth=10 midlayer1_maxwidth=20 minimp=50.000000 maximp=50.000000 favimp=50.000000
23 further rules are at their usual default settings.

## Classes and differential pairs
differential pair class USB_DIFF_Lines: USB.USB
net class USB_DIFF: USB.USB_N USB.USB_P
differential pair class RS485_LINES: RS485 USB.USB
net class RS485: RS485_N RS485_P USB.USB_N USB.USB_P
component class U_RS485_RS232_Sheet: C40 C41 C42 C43 C44 C45 D40 D41 D42 D43 F19 F20 F21 F22 R68 R69 R70 R71 R72 R73 R74 R75 R76 R77 R78 R79 R80 R81 U30 U31 U32 U33
component class U_Power_Sheet: C2 C3 C4 C5 C6 C7 C8 C9 C10 C11 C12 C13 C14 C15 C16 D3 L1 LED1 LED2 P1 P2 P3 P4 P5 P6 P7 R5 R6 R7 R8 R9 R10 R11 R12 R13 R14 R20 U1 U2 U3 U4
component class U_mPCIe_Connector_Sheet: J20 J21 R67 R82 R83 R84
component class U_GPIOs_Expander_Relay_Sheet: 2 C35 C36 C37 C38 D8 D9 D10 D11 K2 K3 R22 R23 R24 R35 R36 R37 R38 R39 R40 R41 R42 R43 R44 R45 R46 R47 R48 R54 R55 RN1 RN2 U11 U20 U27 U28
component class U_DTMF_Decoder_Sheet: C32 C33 C34 C48 D5 D6 D7 D12 D13 LED3 P8 P9 Q1 R21 R25 R26 R27 R28 R29 R30 R31 R32 R33 R87 R88 R89 R90 R91 R92 R93 X2
component class U_Controller_Sheet: ANT1 C17 C18 C19 C20 C21 C22 C23 C24 C25 C26 C27 C28 C29 C30 C31 C39 C46 C47 C54 D4 J12 J17 J19 L2 R15 R16 R17 R18 R19 R34 R65 R66 R85 R86 R94 R95 R96 SB1 SB2 SB3 SW1 U5 U6 U7 U9 X1
component class U_Connector: C1 D1 D2 F1 F2 FB1 J1 J2 J3 J4 J5 J6 J7 J8 J9 J10 J11 J13 J14 R1 R2 R3 R4 R63 R64
differential pair USB.USB: +USB.USB_P -USB.USB_N
differential pair RS485: +RS485_P -RS485_N

## Components (designator, comment, footprint, x,y, rotation, side; value= is the part's Value field where it differs from the comment)
2 "J102K1CS35VDC.20" J102K1CS35VDC.20 565.47,2931.09 r90 top locked (schematic designator K1)
ANT1 "Antenna" ANT* 4103.4,3163.57 r270 top locked net-tie
C1 "4.7nF" Cap-0603 156.44,283.5 r180 bottom locked
C2 "0.1uf" Cap-0402#1 487.65,1078.09 r90 bottom locked
C3 "10nF" Cap-0402#2 840,877.59 r270 bottom locked
C4 "68uF" RVT1H680M0607 1210.14,535.28 r270 top locked
C5 "68uF" RVT1H680M0607 1492.14,535.28 r270 top locked
C6 "68uF" RVT1H680M0607 1772.14,535.28 r270 top locked
C7 "220uF" Case-D 1457.4,996.57 r270 bottom locked
C8 "220uF" Case-D 1257.4,996.57 r270 bottom locked
C9 "0.1uf" Cap-0402#1 1152.4,1581.57 r90 bottom locked
C10 "0.1uf" Cap-0402#1 565.92,1610.5 r180 bottom locked
C11 "10uF" Case-A 988.44,1529.5 r270 bottom locked
C12 "47uF" Case-A 1088.44,1529.5 r270 bottom locked
C13 "0.1uf" Cap-0402#1 924.4,1581.57 r90 bottom locked
C14 "330uF" Case-E 501.42,1487.5 r180 bottom locked
C15 "100uF" Case-B 762.92,1513.5 r0 bottom locked
C16 "0.1uf" Cap-0402#1 640.92,1610.5 r0 bottom locked
C17 "0.1uf" Cap-0402#1 3187.42,2727.83 r0 top locked
C18 "1uF" Cap-0402#1 3417.55,2695.35 r90 bottom locked
C19 "10nF" Cap-0402#1 3376.96,2695.35 r90 bottom locked
C20 "10uF" Cap-0402#1 3533.26,2922.22 r180 bottom locked
C21 "1uF" Cap-0402#1 3533.26,2869.03 r180 bottom locked
C22 "0.1uf" Cap-0402#1 3568.74,2826.98 r180 bottom locked
C23 "0.1uf" Cap-0402#1 3475.17,2825.34 r180 top locked
C24 "0.1uf" Cap-0402#1 2857.82,2751.56 r0 top locked
C25 "10uF" Cap-0402#1 2857.82,2790.56 r0 top locked
C26 "1uF" Cap-0402#1 3076.93,3026.13 r270 top
C27 "0.1uf" Cap-0402#1 2965.57,3064.98 r270 top
C28 "0.1uf" Cap-0402#1 219,843.98 r180 bottom
C29 "22PF" Cap-0402#1 3409.79,2649.22 r90 top locked value=22pF
C30 "22PF" Cap-0402#1 3193.56,2649.22 r270 top locked value=22pF
C31 "330pF" Cap-0603 3720.11,3105.02 r270 top locked
C32 "0.1uf" Cap-0402#1 1784.21,1945.4 r270 top
C33 "0.1uf" Cap-0402#1 1634.8,2159.23 r90 top locked
C34 "0.1uf" Cap-0402#1 1703.3,2161.23 r90 top locked
C35 "0.1uf" Cap-0402#1 3046.4,586.57 r270 bottom locked
C36 "0.1uf" Cap-0402#1 302.21,2540.09 r270 bottom locked
C37 "0.1uf" Cap-0402#1 3055.2,1081.48 r270 bottom locked
C38 "0.1uf" Cap-0402#1 3042.97,1583.57 r270 bottom locked
C39 "1uF" Cap-0402#1 3548.76,2857.4 r180 top
C40 "0.1uf" Cap-0402#1 2984.21,2725.09 r270 bottom locked
C41 "0.1uf" Cap-0402#1 2242.92,2919.22 r270 bottom locked
C42 "0.1uf" Cap-0402#1 2576.5,2762.72 r270 bottom locked
C43 "0.1uf" Cap-0402#1 2653.09,2887.72 r270 bottom
C44 "0.1uf" Cap-0402#1 2586.9,2687.72 r0 bottom locked
C45 "0.1uf" Cap-0402#1 2586.9,2887.72 r0 bottom locked
C46 "330pF" Cap-0603 3682.47,2818.84 r270 top locked
C47 "330pF" Cap-0603 3644.18,3105.02 r270 top locked
C48 "10uF" Cap-0402#1 273.4,1954.69 r270 bottom locked
C54 "0.1uf" Cap-0402#1 3298.85,3098.65 r270 top locked
D1 "PESD5V0H1BSFYL" DSN0603-2 135.92,549.34 r0 top locked
D2 "SMBJ36CA" SMB_ 1125.47,511.09 r90 bottom locked
D3 "ST20100L" TO-277 720.47,846.09 r180 bottom locked
D4 "UDD32C03L01" SOD-323 3548.61,2973.16 r0 bottom locked
D5 "1N4148WT" SOD-523F 1928.83,1829.01 r90 top
D6 "BZT52C5V6S" SOD-323 1634.8,1991.9 r90 top
D7 "BZT52C5V6S" SOD-323 1703.8,1991.9 r90 top
D8 "BZX84C3V3TS-7-F" SOT-363 1321.72,366.09 r270 bottom locked
D9 "BZX84C3V3TS-7-F" SOT-363 2521.96,366.09 r270 bottom locked
D10 "BZX84C3V3TS-7-F" SOT-363 1923.47,366.09 r270 bottom locked
D11 "BZX84C3V3TS-7-F" SOT-363 3121.14,366.09 r270 bottom locked
D12 "1N4148WT" SOD-523F 285.52,2062.07 r270 bottom locked
D13 "1N4148WT" SOD-523F 331.18,2061.95 r90 bottom locked
D40 "SMBJ26CA" SMB_ 3380.16,3221.58 r270 bottom locked
D41 "SMBJ26CA" SMB_ 3041.16,3221.58 r270 bottom locked
D42 "SMBJ26CA" SMB_ 2453.09,3221.58 r270 bottom locked
D43 "SMBJ26CA" SMB_ 2771.09,3221.58 r270 bottom locked
F1 "1206L300SLTHYR" "Fuse 1206 (3216 Metric)" 197.08,545.63 r0 bottom locked
F2 "SHV2920P500-30-AA" Fuse-2920 845.47,591.09 r0 bottom locked
F19 "SMD0805P020TF" Fuse-0805 2573.09,3116.88 r270 bottom locked
F20 "SMD0805P020TF" Fuse-0805 3255.1,3240.88 r90 bottom locked
F21 "SMD0805P020TF" Fuse-0805 3165.1,3240.88 r90 bottom locked
F22 "SMD0805P020TF" Fuse-0805 2653.09,3116.88 r270 bottom locked
FB1 "100MHz" IND-1206 354.02,601.46 r90 bottom locked
J1 "DB128L-5.08-3P-BK-S" DB128L-5.08-3P-BK-S 511.09,3479.58 r180 top locked
J2 "DB128L-5.08-3P-BK-S" DB128L-5.08-3P-BK-S 1111.09,3479.58 r180 top locked
J3 "TYPE-C-31-M-12" TYPE-C-31-M-12_ 61.92,580.83 r270 top locked
J4 "DB128L-5.08-3P-BK-S" DB128L-5.08-3P-BK-S 1321.96,102.58 r0 top locked
J5 "DB128L-5.08-2P-BK-S" DB128L-5.08-2P-BK-S 821.96,102.58 r0 top locked
J6 "DB128L-5.08-3P-BK-S" DB128L-5.08-3P-BK-S 1921.96,102.58 r0 top locked
J7 "DB128L-5.08-3P-BK-S" DB128L-5.08-3P-BK-S 1711.09,3479.58 r180 top locked
J8 "DB128L-5.08-3P-BK-S" DB128L-5.08-3P-BK-S 2521.96,102.58 r0 top locked
J9 "DB128L-5.08-2P-BK-S" DB128L-5.08-2P-BK-S 3021.96,102.58 r0 top locked
J10 "DB128L-5.08-3P-BK-S" DB128L-5.08-3P-BK-S 3311.09,3479.58 r180 top locked
J11 "DB128L-5.08-2P-BK-S" DB128L-5.08-2P-BK-S 3421.96,102.58 r0 top locked
J12 "F0503-ZV-18-20T-R" F0503-ZV-18-20T-R 1064.21,2433.09 r0 top locked
J13 "DB128L-5.08-3P-BK-S" DB128L-5.08-3P-BK-S 2711.09,3479.58 r180 top locked
J14 "DB128L-5.08-2P-BK-S" DB128L-5.08-2P-BK-S 2211.09,3479.58 r180 top locked
J17 "Voltlink Target" "Voltlink Target" 1727.4,2416.45 r180 top locked
J19 "HJ-SMA175" HJ-SMA175 3814.84,3596.09 r270 top locked
J20 "91304-99-052R2" 91304-99-052R2 2245.14,1116.58 r270 top locked
J21 "91304-99-052R2" 91304-99-052R2 2245.14,2519.58 r270 top locked
K2 "J102K1CS35VDC.20" J102K1CS35VDC.20 1163.21,2931.09 r90 top locked
K3 "J102K1CS35VDC.20" J102K1CS35VDC.20 1759.21,2931.09 r90 top locked
L1 "10uH" PSPMAA1040-100M-ANP 883.4,1230.57 r0 bottom locked
L2 "2nH" "IND-0603 (1608 Metric)" 3487.2,2827.34 r180 bottom locked
LED1 "Green" LED-0402 -94.22,2517.61 r180 top locked
LED2 "RED" LED-0603 -84.18,2394.61 r180 top locked
LED3 "Green" LED-0402 -94.22,2270.57 r180 top locked
P1 "TEST POINT" Test-point#1 -113.27,1804.51 r90 top locked
P2 "TEST POINT" Test-point#1 -113.27,1913.51 r90 top locked
P3 "TEST POINT" Test-point#1 -113.27,1695.51 r90 top locked
P4 "TEST POINT" Test-point#2 -113.27,2131.51 r90 top locked
P5 "TEST POINT" Test-point#1 -113.27,1586.51 r90 top locked
P6 "TEST POINT" Test-point#3 -113.27,2022.51 r90 top locked
P7 "TEST POINT" Test-point#1 -113.27,1262.51 r90 top locked
P8 "TEST POINT" Test-point#4 -113.27,1368.51 r0 top locked
P9 "TEST POINT" Test-point#5 -113.27,1477.51 r0 top locked
Q1 "MMBT4403LT1G" sot-23 155.4,2191.57 r0 bottom locked
R1 "5.1K" Res-0402#1 154.42,509.06 r0 top locked
R2 "5.1K" Res-0402#1 154.42,364.5 r0 top locked
R3 "B72210S0300K101" B72210S0300K101 822.47,391.09 r180 top locked value=2.75nF
R4 "1M" Res-0402#1 152.44,238.5 r0 bottom locked
R5 "10K" Res-0201#1 1151.4,1009.57 r90 bottom locked
R6 "1K" Res-0201#1 433.12,1107.59 r0 bottom locked
R7 "10K" Res-0201#1 485.14,1231.09 r0 bottom
R8 "1K" Res-0201#1 443.94,1061.09 r180 bottom locked
R9 "3.24K" Res-0603 1108.47,944.09 r90 bottom locked
R10 "1K" Res-0201#1 -14.71,2517.33 r0 bottom locked
R11 "100K" Res-0201#1 417.4,1639.57 r270 bottom locked
R12 "470R" Res-0201#2 591.44,1571.57 r180 bottom locked
R13 "10K" Res-0201#3 783.86,1764.19 r90 bottom locked
R14 "47K" Res-0402#1 381.4,1635.57 r90 bottom locked
R15 "4.7K" Res-0402#1 3165.39,2754.83 r270 bottom locked
R16 "4.7K" Res-0402#1 3204.42,2754.83 r270 bottom locked
R17 "499R" Res-0402#1 3319.02,2749.83 r270 bottom locked
R18 "4.7K" Res-0402#1 3075.78,2763.5 r270 bottom
R19 "4.7K" Res-0402#1 3025.78,2763.5 r270 bottom
R20 "470R" Res-0201#1 0.62,2394.14 r0 bottom locked
R21 "0R" Res-0402#1 241.4,2146.2 r270 bottom locked
R22 "100K" YC164-JR-070RL 3124.63,714.3 r0 bottom locked
R23 "100K" YC164-JR-070RL 2580.17,815.2 r180 bottom locked
R24 "100K" YC164-JR-070RL 2580.17,671.81 r180 bottom locked
R25 "56k" Res-0402#1 1634.8,2091.34 r270 top value=56kR
R26 "56k" Res-0402#1 1559.8,1945.4 r270 top value=56kR
R27 "330K" Res-0603 1880.1,1838.38 r90 top value=330kR
R28 "150K" Res-0402#1 1458,1837.9 r270 top
R29 "100K" Res-0201#1 1890.94,1771.75 r0 top
R30 "47K" Res-0402#1 1517.8,1945.4 r270 top
R31 "68K" Res-0603 1414.41,1888.56 r90 top
R32 "56k" Res-0402#1 1703.3,2091.34 r270 top value=56kR
R33 "56k" Res-0402#1 1369,1876.72 r270 top value=56kR
R34 "10K" Res-0201#1 3481.3,2875.66 r0 top
R35 "4.7K" Res-0402#2 1274.72,235.06 r90 bottom locked
R36 "4.7K" Res-0402#2 2472.47,236.09 r90 bottom locked
R37 "4.7K" Res-0402#2 1321.72,235.06 r90 bottom locked
R38 "4.7K" Res-0402#2 2521.96,235.06 r90 bottom locked
R39 "4.7K" Res-0402#2 1367.72,235.06 r90 bottom locked
R40 "4.7K" Res-0402#2 2572.47,236.09 r90 bottom locked
R41 "4.7K" Res-0402#2 1876.14,235.06 r90 bottom locked
R42 "4.7K" Res-0402#2 3076.14,235.06 r90 bottom locked
R43 "4.7K" Res-0402#2 1922.14,235.06 r90 bottom locked
R44 "4.7K" Res-0402#2 3121.14,235.06 r90 bottom locked
R45 "4.7K" Res-0402#2 1968.55,235.06 r90 bottom locked
R46 "4.7K" Res-0402#2 3167.14,235.06 r90 bottom locked
R47 "10K" Res-0201#1 2646.21,548.09 r180 bottom locked
R48 "10K" Res-0201#1 2669.21,574.19 r180 bottom locked
R54 "10K" Res-0201#1 2670.37,998.57 r270 bottom locked
R55 "10K" Res-0201#1 2668.67,1504.54 r270 bottom locked
R63 "0R" Res-0402#1 154.42,415.83 r0 top locked
R64 "0R" Res-0402#1 154.42,454.69 r0 top locked
R65 "0R" Res-0402#1 1093,2430 r0 bottom locked
R66 "0R" Res-0402#1 1093.74,2463.81 r0 bottom locked
R67 "0R" Res-0402#1 2493.14,907.58 r0 top locked
R68 "4.7K" Res-0402#1 2934.14,2452.75 r270 bottom locked
R69 "4.7K" Res-0402#1 2832.14,2452.75 r270 bottom locked
R70 "4.7K" Res-0402#1 2884.14,2452.75 r270 bottom locked
R71 "4.7K" Res-0402#1 2784.14,2452.75 r270 bottom locked
R72 "4.7K" Res-0402#1 2922.57,2873.56 r90 bottom locked
R73 "22R" Res-0402#1 2586.9,2587.72 r180 bottom locked
R74 "22R" Res-0402#1 2879.82,2873.56 r90 bottom locked
R75 "22R" Res-0402#1 2837.14,2873.56 r90 bottom locked
R76 "22R" Res-0402#1 2586.9,2637.72 r180 bottom locked
R77 "4.7K" Res-0402#1 2794.39,2873.56 r270 bottom locked
R78 "120R" Res-0603 2858.14,2807.06 r180 bottom locked
R79 "1K" Res-0201#1 2756.27,2055 r270 bottom locked
R80 "1K" Res-0201#1 2706.27,2055 r270 bottom locked
R81 "1K" Res-0201#1 2928.27,2055 r270 bottom locked
R82 "0R" Res-0402#1 2528,2310 r0 top locked
R83 "0R" Res-0402#1 2493.14,870.58 r0 top locked
R84 "0R" Res-0402#1 2528,2273 r0 top locked
R85 "1K" Res-0201#1 3719.51,2857.84 r90 top locked
R86 "1K" Res-0201#1 3644.71,2857.84 r90 top locked
R87 "68R" Res-0402#1 167.4,2274.57 r180 bottom locked
R88 "0R" Res-0402#1 156.4,2040.57 r270 bottom locked
R89 "0R" Res-0402#1 199.4,2040.57 r270 bottom locked
R90 "680R" Res-0603 44.56,2201.57 r90 bottom locked
R91 "680R" Res-0603 333.4,1949.69 r270 bottom locked
R92 "3.3K" Res-0402#1 180.4,2101.57 r180 bottom locked
R93 "10K" Res-0201#1 241.4,2080.57 r90 bottom locked
R94 "10K" Res-0201#1 3480.91,2900.79 r0 top locked
R95 "10K" Res-0201#1 3496.45,2929.51 r0 top locked
R96 "10K" Res-0201#1 3235.78,2764.52 r270 bottom locked
RN1 "10K" YC164-FR-0710KL 3109.72,1717.01 r0 bottom locked value=10kR
RN2 "10K" YC164-FR-0710KL 2606.09,1705.65 r180 bottom locked value=10kR
SB1 "Solder Bridge 0402" "Solder Bridge 0402" 2652.01,1041.09 r0 bottom locked
SB2 "Solder Bridge 0402" "Solder Bridge 0402" 2663.73,489.15 r90 bottom locked
SB3 "Solder Bridge 0402" "Solder Bridge 0402" 2650.17,1547.46 r0 bottom locked
SW1 "1825027-8" 1825027-8 94.88,981.98 r270 top locked
U1 "TPS5450DDAR" 8-SO-EP_ 970.47,876.09 r270 bottom locked
U2 "TPS2116DRLR" SOT-583 464.47,1175.09 r90 bottom locked
U3 "LM1084S-3.3/TR" TO263-3_ 1088.44,1909.67 r180 bottom locked
U4 "MIC29302WU-TR" "TO-263-5 (D2PAK)" 603.44,1910.15 r180 bottom locked
U5 "W25Q64JVSSIQ TR" "SOIC-8 (208 mil)" 2822.71,2926.84 r0 top locked
U6 "ESP32-S3R8" "56-QFN (7x7)" 3275.23,2899.28 r180 top locked
U7 "ATECC608B-SSHDA-B" SOIC-8 3000.61,2662.45 r90 top locked
U8 "MT8870DN1" SSOP-20-208mil 1672.01,1760.56 r0 top
U9 "HMC221BETR" SOT-23-6 3682.11,2963.02 r270 top locked
U11 "MCP23017T-E/SS" SSOP-28-208mil 2857.22,638.17 r180 bottom locked
U20 "ULN2003A" SOP-16_150mil 527.14,2454.58 r90 bottom locked
U27 "MCP23017T-E/SS" SSOP-28-208mil 2857.53,1131.37 r180 bottom locked
U28 "MCP23017T-E/SS" SSOP-28-208mil 2857.53,1635.02 r180 bottom locked
U30 "MAX3232IDR" SOIC-16 2406.4,2762.72 r180 bottom locked
U31 "SP3485EIM/TR" SOP-8 2859.14,2634.75 r90 bottom locked
U32 "ADUM1201ARZ-RL7" SOIC-8 2731.27,2219.96 r90 bottom locked
U33 "ADUM1200ARZ-RL7" SOIC-8 2953.27,2220.29 r270 bottom locked
X1 "40MHz" X322540MPB4SI_ 3302.25,2649.75 r180 top locked value=40MHZ
X2 "3.579545MHz" HC-49S-SMD 1676.8,1500 r0 top

## Footprints (in the part's own frame and the unit in brackets; to place one, negate y for a bottom-side part, rotate by r counter-clockwise, add the part's x,y. Pads: shape width x height; smd on the part's side, far side on the other; paste and mask are expansions set on the pad)
8-SO-EP_ [mm]
  rect 1.505x0.802 smd: 1(-2.497,1.905) 2(-2.497,0.635) 3(-2.497,-0.635) 4(-2.497,-1.905) 5(2.498,-1.905) 6(2.498,-0.635) 7(2.498,0.635) 8(2.498,1.905)
  rect 2.75x3.502 smd: 9(0,0)
  silkscreen extent -3.53,-2.51 2.03,2.51, body extent -3,-2.45 3,2.45, height 1.7
"56-QFN (7x7)" [mm]
  rect 0.65x0.22 smd: 1(-3.425,2.6) 2(-3.425,2.2) 3(-3.425,1.8) 4(-3.425,1.4) 5(-3.425,1) 6(-3.425,0.6) 7(-3.425,0.2) 8(-3.425,-0.2) 9(-3.425,-0.6) 10(-3.425,-1) 11(-3.425,-1.4) 12(-3.425,-1.8) 13(-3.425,-2.2) 14(-3.425,-2.6) 29(3.425,-2.6) 30(3.425,-2.2) 31(3.425,-1.8) 32(3.425,-1.4) 33(3.425,-1) 34(3.425,-0.6) 35(3.425,-0.2) 36(3.425,0.2) 37(3.425,0.6) 38(3.425,1) 39(3.425,1.4) 40(3.425,1.8) 41(3.425,2.2) 42(3.425,2.6)
  rect 0.22x0.65 smd: 15(-2.6,-3.425) 16(-2.2,-3.425) 17(-1.8,-3.425) 18(-1.4,-3.425) 19(-1,-3.425) 20(-0.6,-3.425) 21(-0.2,-3.425) 22(0.2,-3.425) 23(0.6,-3.425) 24(1,-3.425) 25(1.4,-3.425) 26(1.8,-3.425) 27(2.2,-3.425) 28(2.6,-3.425) 43(2.6,3.425) 44(2.2,3.425) 45(1.8,3.425) 46(1.4,3.425) 47(1,3.425) 48(0.6,3.425) 49(0.2,3.425) 50(-0.2,3.425) 51(-0.6,3.425) 52(-1,3.425) 53(-1.4,3.425) 54(-1.8,3.425) 55(-2.2,3.425) 56(-2.6,3.425)
  rect 3.556x3.556 smd: 57(0,0)
  silkscreen extent -4.04,-3.56 3.56,3.56, body extent -3.5,-3.51 3.5,3.49, height 0.92
91304-99-052R2 [mm]
  rect 0.6x2 smd: 1(-11.8,-4.1) 2(-11.4,4.1) 3(-11,-4.1) 4(-10.6,4.1) 5(-10.2,-4.1) 6(-9.8,4.1) 7(-9.4,-4.1) 8(-9,4.1) 9(-8.6,-4.1) 10(-8.2,4.1) 11(-7.8,-4.1) 12(-7.4,4.1) 13(-7,-4.1) 14(-6.6,4.1) 15(-6.2,-4.1) 16(-5.8,4.1) 17(-2.2,-4.1) 18(-1.8,4.1) 19(-1.4,-4.1) 20(-1,4.1) 21(-0.6,-4.1) 22(-0.2,4.1) 23(0.2,-4.1) 24(0.6,4.1) 25(1,-4.1) 26(1.4,4.1) 27(1.8,-4.1) 28(2.2,4.1) 29(2.6,-4.1) 30(3,4.1) 31(3.4,-4.1) 32(3.8,4.1) 33(4.2,-4.1) 34(4.6,4.1) 35(5,-4.1) 36(5.4,4.1) 37(5.8,-4.1) 38(6.2,4.1) 39(6.6,-4.1) 40(7,4.1) 41(7.4,-4.1) 42(7.8,4.1) 43(8.2,-4.1) 44(8.6,4.1) 45(9,-4.1) 46(9.4,4.1) 47(9.8,-4.1) 48(10.2,4.1) 49(10.6,-4.1) 50(11,4.1) 51(11.4,-4.1) 52(11.8,4.1)
  rect 2.3x3.2 smd: 53(-14.65,-3.5) 54(14.65,-3.5)
  rect 0x0 hole 1.6 unplated: MH(-12.5,0)
  rect 0x0 hole 1.1 unplated: MH(12.5,0)
  silkscreen extent -15.01,-3.76 15.01,4.6, body extent -14.96,-4.55 14.94,4.55, height 9.96
1825027-8 [mm]
  round 1.8 hole 1.1: 1(-2.25,-1.245) 2(2.25,-1.245)
  round 2.1 hole 1.3: 3(3.505,1.245) 4(-3.505,1.245)
  silkscreen extent -4.01,-3.71 4.06,2.79, body extent -4.18,-7.11 4.23,2.73, height 8
ANT* [mm]
  rect 0.5x0.5 smd: ANT#(-3.2,-3.08) GND(-4.678,-3.079)
  Top Layer region: 5.072,4.941 4.572,4.941 4.572,0.941 5.072,0.941
  Top Layer region: 2.572,0.941 3.072,0.941 3.072,4.941 2.572,4.941
  Top Layer region: 5.078,0.935 5.078,1.435 2.578,1.435 2.578,0.935
  Top Layer region: 1.078,0.947 1.078,1.447 -1.422,1.447 -1.422,0.947
  Top Layer region: -1.428,0.941 -0.928,0.941 -0.928,4.941 -1.428,4.941
  Top Layer region: 1.072,4.941 0.572,4.941 0.572,0.941 1.072,0.941
  Top Layer region: 6.572,0.941 7.072,0.941 7.072,4.941 6.572,4.941
  Top Layer region: -4.928,4.941 -4.928,4.441 -0.928,4.441 -0.928,4.941
  Top Layer region: 4.578,4.947 4.578,4.447 7.078,4.447 7.078,4.947
  Top Layer region: 0.578,4.947 0.578,4.447 3.078,4.447 3.078,4.947
  Top Layer region: -4.929,-2.859 -4.429,-2.859 -4.429,4.941 -4.929,4.941
  Top Layer region: -3.45,-2.86 -2.95,-2.86 -2.95,4.94 -3.45,4.94
  silkscreen extent -5,-3.4 7.14,5.01
B72210S0300K101 [mm]
  round 1.8 hole 1.05: 1(-3.75,0.75) 2(3.75,-0.75)
  silkscreen extent -5.79,-1.6 5.79,1.6, body extent -5.75,-1.55 5.75,1.55, height 13.75
Cap-0402#1 [mil]
  rect 18x25 smd mask+2.36: 1(-18.5,0) 2(18.5,0)
  silkscreen extent -31,-16 31,16, body extent -20,-10 20,10, height 19
Cap-0402#2 [mil]
  rect 25x25 smd mask+2.36: 1(-18.5,0)
  rect 18x25 smd mask+2.36: 2(18.5,0)
  silkscreen extent -31,-16 31,16, body extent -20,-10 20,10, height 19
Cap-0603 [mil]
  rect 30x35 smd mask+2.36: 1(-30,0) 2(30,0)
  silkscreen extent -49,-21 49,21, body extent -32,-16 31,16, height 34
Case-A [mm]
  rect 1.42x1.13 smd: 1(-1.2,0) 2(1.2,0)
  silkscreen extent -2.72,-0.97 1.63,0.97, body extent -1.6,-0.9 1.6,0.9, height 1.8
Case-B [mm]
  rect 1.7x3 smd paste+0: 1(-1.7,0) 2(1.7,0)
  silkscreen extent -1.93,-1.63 2.03,1.63, body extent -1.85,-1.5 1.85,1.5, height 2.16
Case-D [mm]
  rect 2.4x2.9 smd: 1(-3.05,0) 2(3.05,0)
  silkscreen extent -4.7,-2.15 3.65,2.39, body extent -3.65,-2.16 3.65,2.14, height 4
Case-E [mm]
  rect 2.79x2.57 smd: 1(0,0) 2(6.44,0)
  silkscreen extent -1.56,-2.31 7.03,2.31, body extent -0.27,-2.21 6.92,2.21, height 2.88
DB128L-5.08-2P-BK-S [mm]
  rect 3x3 hole 1.6: 1(-2.54,0)
  round 3 hole 1.6: 2(2.54,0)
  silkscreen extent -5.13,-5.08 5.13,5.13, body extent -5.08,-5.03 5.13,5.07, height 10.3
DB128L-5.08-3P-BK-S [mm]
  rect 3x3 hole 1.6: 1(-5.08,0)
  round 3 hole 1.6: 2(0,0) 3(5.08,0)
  silkscreen extent -7.67,-5.08 7.67,5.13, body extent -7.59,-5.03 7.65,5.07, height 10.1
DSN0603-2 [mm]
  rect 0.2x0.24 smd mask+0.055: 1(-0.2,0) 2(0.2,0)
  silkscreen extent -0.38,-0.2 0.38,0.2, body extent -0.3,-0.15 0.3,0.15, height 0.32
F0503-ZV-18-20T-R [mm]
  rect 0.4x1.25 smd: 1(-4.25,-1.125) 1(-4.25,-1.125) 2(-3.75,1.125) 3(-3.25,-1.125) 4(-2.75,1.125) 5(-2.25,-1.125) 6(-1.75,1.125) 7(-1.25,-1.125) 8(-0.75,1.125) 9(-0.25,-1.125) 10(0.25,1.125) 11(0.75,-1.125) 12(1.25,1.125) 13(1.75,-1.125) 14(2.25,1.125) 15(2.75,-1.125) 16(3.25,1.125) 17(3.75,-1.125) 18(4.25,1.125)
  rect 1.8x2 smd: MP1(-6.05,0) MP2(6.05,0)
  silkscreen extent -7.65,-2.11 7.65,1.5, body extent -7.6,-1.5 7.6,1.46, height 4.61
"Fuse 1206 (3216 Metric)" [mm] "0.126\" L x 0.062\" W x 0.026\" H (3.20mm x 1.58mm x 0.65mm)"
  rect 1.06x1.82 smd: 1(-1.528,0) 2(1.528,0)
  silkscreen extent -0.68,-0.85 0.68,0.85, body extent -1.6,-0.79 1.6,0.79, height 0.85
Fuse-0805 [mm]
  rect 1x1.7 smd: 1(-1.1,0) 2(1.1,0)
  silkscreen extent -0.41,-0.81 0.41,0.81, body extent -1.1,-0.75 1.1,0.75, height 1.24
Fuse-2920 [mm]
  rect 2.3x5.6 smd: 1(-3.7,0) 2(3.7,0)
  silkscreen extent -2.18,-2.62 2.24,2.62, body extent -3.68,-2.56 3.68,2.56, height 0.9
HC-49S-SMD [mm]
  rect 5.5x2 smd: 1(-4.75,0) 2(4.75,0)
  silkscreen extent -5.71,-2.51 5.71,2.51, body extent -6.7,-2.45 6.7,2.45, height 4.4
HJ-SMA175 [mm]
  round 2.5 hole 1.4: 1(0,0)
  round 2.5 hole 1.5: 2(-2.54,2.54) 3(-2.54,-2.54) 4(2.54,-2.54) 5(2.54,2.54)
  silkscreen extent -3.54,-3.05 3.05,3.05, body extent -14.01,-3 2.99,3, height 6.4
"IND-0603 (1608 Metric)" [mm] "0.063\" L x 0.032\" W (1.60mm x 0.80mm)"
  rect 0.6x0.8 smd: 1(-0.7,0) 2(0.7,0)
  silkscreen extent -0.2,-0.46 0.23,0.46, body extent -0.8,-0.4 0.8,0.4, height 0.78
IND-1206 [mm]
  rect 1.4x1.82 smd: 1(-1.36,0) 2(1.36,0)
  silkscreen extent -0.34,-0.85 0.34,0.85, body extent -1.6,-0.8 1.6,0.8, height 1.3
J102K1CS35VDC.20 [mm]
  rect 2x2 hole 1.02: 1(-6.35,-3.81)
  round 2 hole 1.02: 2(3.81,3.81) 3(6.35,3.81) 4(3.81,-3.81) 5(6.35,-3.81)
  silkscreen extent -7.77,-5.29 7.77,5.29, body extent -7.77,-5.29 7.77,5.29, height 11.8
LED-0402 [mm]
  rect 0.62x0.72 smd: 1(-0.475,0) 2(0.475,0)
  silkscreen extent -0.89,-0.51 1.55,0.51, body extent -0.5,-0.25 0.51,0.25, height 0.45
LED-0603 [mm]
  rect 0.5x1 smd: 1(-0.75,0) 2(0.75,0)
  silkscreen extent -1.12,-0.66 1.75,0.66, body extent -0.82,-0.37 0.82,0.36, height 0.68
PSPMAA1040-100M-ANP [mm]
  rect 3.5x4 smd: 1(-4.75,0) 2(4.75,0)
  silkscreen extent -5.38,-5.03 5.64,5.03, body extent -5.57,-5.03 5.83,4.97, height 4
Res-0201#1 [mm]
  rect 0.27x0.37 smd mask+0.055: 1(-0.275,0) 2(0.275,0)
  silkscreen extent -0.48,-0.25 0.48,0.25, body extent -0.3,-0.15 0.3,0.15, height 0.29
Res-0201#2 [mm]
  rect 0.27x0.37 smd mask+0.055: 1(-0.275,0)
  rect 0.27x0.406 smd mask+0.055: 2(0.275,0)
  silkscreen extent -0.48,-0.25 0.48,0.25, body extent -0.3,-0.15 0.3,0.15, height 0.29
Res-0201#3 [mm]
  rect 0.356x0.457 smd mask+0.055: 1(-0.275,0) 2(0.275,0)
  silkscreen extent -0.48,-0.25 0.48,0.25, body extent -0.3,-0.15 0.3,0.15, height 0.29
Res-0402#1 [mil]
  rect 18x25 smd mask+2.17: 1(-18.5,0) 2(18.5,0)
  silkscreen extent -32,-17 32,16, body extent -23,-11 23,11, height 16
Res-0402#2 [mil]
  rect 25x25 smd mask+2.17: 1(-18.5,0)
  rect 18x25 smd mask+2.17: 2(18.5,0)
  silkscreen extent -32,-17 32,16, body extent -23,-11 23,11, height 16
Res-0603 [mil]
  rect 30x35 smd: 1(-30,0) 2(30,0)
  silkscreen extent -48,-21 48,21, body extent -31,-17 31,17, height 18
RVT1H680M0607 [mm]
  rect 3.5x1.6 smd: 1(-2.7,0) 2(2.7,0)
  silkscreen extent -4.25,-3.33 3.35,3.33, body extent -3.3,-3.3 3.3,3.3, height 7.94
SMB_ [mm]
  rect 2.8x2.4 smd: 1(-2.3,0) 2(2.3,0)
  silkscreen extent -2.21,-1.91 4.83,1.91, body extent -2.7,-1.8 2.7,1.8, height 2.3
SOD-323 [mm]
  rect 0.8x0.9 smd mask+0.055: 1(-1.15,0) 2(1.15,0)
  silkscreen extent -2.01,-0.79 0.94,0.79, body extent -1.3,-0.67 1.3,0.67, height 1.1
SOD-523F [mm]
  rect 0.8x0.52 smd: 1(-1,0) 2(1,0)
  silkscreen extent -0.64,-0.51 1.78,0.51, body extent -0.8,-0.4 0.8,0.4, height 0.7
SOIC-8 [mm]
  rect 1.55x0.6 smd: 1(-2.7,1.905) 2(-2.7,0.635) 3(-2.7,-0.635) 4(-2.7,-1.905) 5(2.7,-1.905) 6(2.7,-0.635) 7(2.7,0.635) 8(2.7,1.905)
  silkscreen extent -3.76,-2.49 1.99,2.49, body extent -3,-2.45 3,2.45, height 1.7
"SOIC-8 (208 mil)" [mm]
  rect 1.61x0.58 smd: 1(-3.605,1.905) 2(-3.605,0.635) 3(-3.605,-0.635) 4(-3.605,-1.905) 5(3.605,-1.905) 6(3.605,-0.635) 7(3.605,0.635) 8(3.605,1.905)
  silkscreen extent -4.7,-2.69 2.69,2.69, body extent -3.95,-2.64 3.95,2.64, height 2.16
SOIC-16 [mm]
  rect 1.95x0.55 smd: 1(-2.41,4.445) 2(-2.41,3.175) 3(-2.41,1.905) 4(-2.41,0.635) 5(-2.41,-0.635) 6(-2.41,-1.905) 7(-2.41,-3.175) 8(-2.41,-4.445) 9(2.41,-4.445) 10(2.41,-3.175) 11(2.41,-1.905) 12(2.41,-0.635) 13(2.41,0.635) 14(2.41,1.905) 15(2.41,3.175) 16(2.41,4.445)
  silkscreen extent -3.71,-5 1.96,5, body extent -3,-4.95 3,4.95, height 1.75
"Solder Bridge 0402" [mil]
  rect 18x25 smd mask+2.17: 1(-18.5,0) 2(18.5,0)
  silkscreen extent -32,-17 32,16
SOP-8 [mm]
  rect 1.3x0.7 smd: 1(-2.75,1.905) 2(-2.75,0.635) 3(-2.75,-0.635) 4(-2.75,-1.905) 5(2.75,-1.905) 6(2.75,-0.635) 7(2.75,0.635) 8(2.75,1.905)
  silkscreen extent -3.69,-2.57 2.03,2.57, body extent -3.1,-2.5 3.1,2.5, height 1.76
SOP-16_150mil [mm]
  rect 1.1x0.6 smd: 1(-2.875,4.445) 2(-2.875,3.175) 3(-2.875,1.905) 4(-2.875,0.635) 5(-2.875,-0.635) 6(-2.875,-1.905) 7(-2.875,-3.175) 8(-2.875,-4.445) 9(2.875,-4.445) 10(2.875,-3.175) 11(2.875,-1.905) 12(2.875,-0.635) 13(2.875,0.635) 14(2.875,1.905) 15(2.875,3.175) 16(2.875,4.445)
  silkscreen extent -3.71,-5.03 1.91,5.03, body extent -3.04,-5 3.04,5, height 1.62
sot-23 [mm] "TRANS NPN 40V 0.6A SOT23"
  rect 0.82x0.92 smd: 1(-0.95,-1) 2(0.95,-1) 3(0,1)
  silkscreen extent -1.55,-0.79 1.55,0.81, body extent -1.5,-1.25 1.5,1.25, height 1.05
SOT-23-6 [mm]
  rect 1.22x0.62 smd: 1(-1.31,0.95) 2(-1.31,0) 3(-1.31,-0.95) 4(1.31,-0.95) 5(1.31,0) 6(1.31,0.95)
  silkscreen extent -2.18,-1.52 0.86,1.52, body extent -1.5,-1.5 1.5,1.5, height 1.47
SOT-363 [mm]
  rect 0.8x0.4 smd: 1(-0.97,0.65) 2(-0.97,0) 3(-0.97,-0.65) 4(0.97,-0.65) 5(0.97,0) 6(0.97,0.65)
  silkscreen extent -1.65,-1.09 0.51,1.09, body extent -1.15,-1.05 1.15,1.05, height 1
SOT-583 [mm]
  rect 0.67x0.3 smd: 1(-0.74,0.75) 2(-0.74,0.25) 3(-0.74,-0.25) 4(-0.74,-0.75) 5(0.74,-0.75) 6(0.74,-0.25) 7(0.74,0.25) 8(0.74,0.75)
  silkscreen extent -1.35,-1.07 0.56,1.07, body extent -0.8,-1.05 0.8,1.05, height 0.6
SSOP-20-208mil [mm]
  rect 2x0.42 smd: 1(-3.491,2.925) 2(-3.491,2.275) 3(-3.491,1.625) 4(-3.491,0.975) 5(-3.491,0.325) 6(-3.491,-0.325) 7(-3.491,-0.975) 8(-3.491,-1.625) 9(-3.491,-2.275) 10(-3.491,-2.925) 11(3.491,-2.925) 12(3.491,-2.275) 13(3.491,-1.625) 14(3.491,-0.975) 15(3.491,-0.325) 16(3.491,0.325) 17(3.491,0.975) 18(3.491,1.625) 19(3.491,2.275) 20(3.491,2.925)
  silkscreen extent -4.78,-3.68 2.57,3.68, body extent -4.01,-3.62 4.01,3.63, height 1.95
SSOP-28-208mil [mm]
  rect 1.25x0.42 smd: 1(-3.4,4.225) 2(-3.4,3.575) 3(-3.4,2.925) 4(-3.4,2.275) 5(-3.4,1.625) 6(-3.4,0.975) 7(-3.4,0.325) 8(-3.4,-0.325) 9(-3.4,-0.975) 10(-3.4,-1.625) 11(-3.4,-2.275) 12(-3.4,-2.925) 13(-3.4,-3.575) 14(-3.4,-4.225) 15(3.4,-4.225) 16(3.4,-3.575) 17(3.4,-2.925) 18(3.4,-2.275) 19(3.4,-1.625) 20(3.4,-0.975) 21(3.4,-0.325) 22(3.4,0.325) 23(3.4,0.975) 24(3.4,1.625) 25(3.4,2.275) 26(3.4,2.925) 27(3.4,3.575) 28(3.4,4.225)
  silkscreen extent -4.34,-5.21 2.72,5.21, body extent -3.88,-5.17 3.88,5.17, height 2.15
Test-point#1 [mil]
  oct 60x60 smd: 1(0,0)
  silkscreen extent -37,-37 37,37
Test-point#2 [mil]
  oct 60x60 smd: 1(-763,0)
  silkscreen extent -37,-37 37,37
Test-point#3 [mil]
  oct 60x60 smd: 1(-545,0)
  silkscreen extent -37,-37 37,37
Test-point#4 [mil]
  oct 60x60 smd: 1(0,763)
  silkscreen extent -37,-37 37,37
Test-point#5 [mil]
  oct 60x60 smd: 1(0,545)
  silkscreen extent -37,-37 37,37
TO263-3_ [mil]
  rect 64x170 smd: 1(-100,-180)
  rect 60x170 smd: 2(0,-180) 3(100,-180)
  rect 440x390 smd: 4(0,180)
  silkscreen extent -205,-172 204,382, body extent -203,-215 203,380, height 181
"TO-263-5 (D2PAK)" [mm]
  rect 1.02x4.32 smd: 1(-3.4,-4.573) 2(-1.7,-4.573) 3(0,-4.573) 4(1.7,-4.573) 5(3.4,-4.573)
  rect 11.18x9.91 smd: 6(0,4.573)
  silkscreen extent -5.16,-1.27 5.16,-0.61, body extent -5.11,-5.78 5.05,9.13, height 4.83
TO-277 [mm]
  rect 1.3x1.3 smd: 1(-0.93,-1.975) 3(0.93,-1.975)
  rect 3.4x4.6 smd: 2(0,1.975)
  silkscreen extent -2.16,-2.59 2.16,3.73, body extent -2.1,-2.39 2.1,4.06, height 1.2
TYPE-C-31-M-12_ [mm]
  rect 0.6x1.2 smd: A1/B12(0,0) A4/B9(0.8,0) B1/A12(6.4,0) B4/A9(5.6,0)
  rect 0.3x1.2 smd: A5(1.95,0) A6(2.95,0) A7(3.45,0) A8(4.45,0) B5(4.95,0) B6(3.95,0) B7(2.45,0) B8(1.45,0)
  round 0 hole 0.62 unplated: MH(0.31,-1.07) MH(6.09,-1.07)
  oval 0.9x2 hole 0.6 slot 1.7 at 90 deg: S1(7.525,-0.57) S4(-1.125,-0.57)
  oval 0.9x1.7 hole 0.6 slot 1.4 at 90 deg: S2(7.525,-4.75) S3(-1.125,-4.75)
  silkscreen extent -1.3,-5.94 7.7,-1.93, body extent -1.27,-7.32 7.67,0.58, height 3.31
"Voltlink Target" [mm]
  rect 0.5x1.6 smd: 1(-2.5,-1.262) 2(-1.5,-1.262) 3(-0.5,-1.262) 4(0.5,-1.262) 5(1.5,-1.262) 6(2.5,-1.262)
  rect 1.2x1.8 smd: MP1(-3.8,1.262) MP2(3.8,1.262)
  silkscreen extent -4.06,-1.68 4.06,2.17, body extent -4,-1.49 4,2.11, height 4.25
X322540MPB4SI_ [mm]
  rect 1.4x1.2 smd: 1(-1.1,-0.85) 2(1.1,-0.85) 3(1.1,0.85) 4(-1.1,0.85)
  silkscreen extent -2.13,-1.3 1.65,1.3, body extent -1.6,-1.25 1.6,1.25, height 0.8
YC164-FR-0710KL [mm]
  rect 0.9x0.65 smd: 1(0,0) 4(0,-2.48) 5(1.77,-2.48) 8(1.77,0)
  rect 0.9x0.53 smd: 2(0,-0.84) 3(0,-1.64) 6(1.77,-1.64) 7(1.77,-0.84)
  silkscreen extent -0.79,-2.96 1.77,0.48, body extent 0.08,-2.84 1.69,0.36, height 0.7
YC164-JR-070RL [mm]
  rect 0.9x0.65 smd: 1(-0.885,1.24) 4(-0.885,-1.24) 5(0.885,-1.24) 8(0.885,1.24)
  rect 0.9x0.53 smd: 2(-0.885,0.4) 3(-0.885,-0.4) 6(0.885,-0.4) 7(0.885,0.4)
  silkscreen extent -1.68,-1.72 0.88,1.72, body extent -0.8,-1.6 0.8,1.6, height 0.7

## Part data
2 K2 K3: "RELAY GEN PURPOSE SPDT 3A 5V", Manufacturer="CIT Relay & Switch", Supplier Part Number=2449-J102K1CS35VDC.20-ND, Category="Power Relays", Manufacturer Part Number=J102K1CS35VDC.20, Pricing="1=0.97, 10=0.909, 25=0.808, 50=0.7676, 100=0.7272, 250=0.6464, 500=0.606, 1000=0.5656, 5000=0.5454 (USD)", RoHS=No, Stock=15659, Supplier=Digi-Key
C1: library part CC0603JRNPO9BN472, "CAP CER 4700PF 50V C0G/NPO 0603", LCSC Part Number=C576818, Manufacturer=Yageo, Supplier Part Number 1=13-CC0603JRNPO9BN472CT-ND, Category="Ceramic Capacitors", ComponentLink1Description=LCSC, ComponentLink1URL=https://www.lcsc.com/product-detail/Multilayer-Ceramic-Capacitors-MLCC-SMD-SMT_YAGEO-CC0603JRNPO9BN472_C576818.html, Item Type=Capacitor, Manufacturer Part Number=CC0603JRNPO9BN472, Pricing 1="1=0.48000, 10=0.33000, 50=0.23100, 100=0.19800, 500=0.14854, 1000=0.12543 (USD)", RoHS=Yes, RoHS Compliant=Yes, Stock 1=31779, Supplier 1=Digi-Key
C2 C9 C10 C13 C16 C17 C22 C23 C24 C27 C28 C32 C33 C34 C35 C36 C37 C38 C40 C41 C42 C43 C44 C45 C54: library part GRM155R62A104KE14D, "CAP CER 0.1UF 100V X5R 0402", Capacitance=100nF, Case Code (Imperial)=0402, Case Code (Metric)=1005, Dielectric=X5R, LCSC Part Number=C162178, Manufacturer=Murata, Max Operating Temperature=85°C, Min Operating Temperature=-55°C, Package Quantity=10000, Tolerance=10%, Voltage Rating=100V, Case/Package=0402, Category="Ceramic Capacitors", ComponentLink1Description=http://www.farnell.com/datasheets/2079151.pdf?src-supplier=Farnell, ComponentLink1URL=http://www.farnell.com/datasheets/2079151.pdf?src-supplier=Farnell, ComponentLink2Description=http://www.mouser.com/ds/2/281/c02e-2905.pdf?src-supplier=Mouser, ComponentLink2URL=http://www.mouser.com/ds/2/281/c02e-2905.pdf?src-supplier=Mouser, ComponentLink3Description=http://www.farnell.com/datasheets/2079151.pdf?src-supplier=Element14, ComponentLink3URL=http://www.farnell.com/datasheets/2079151.pdf?src-supplier=Element14, ComponentLink4Description=http://search.murata.co.jp/Ceramy/image/img/A01X/G101/ENG/GRM155R62A104KE14-01.pdf?src-supplier=Digi-Key, ComponentLink4URL=http://search.murata.co.jp/Ceramy/image/img/A01X/G101/ENG/GRM155R62A104KE14-01.pdf?src-supplier=Digi-Key, ComponentLink5Description=http://www.farnell.com/datasheets/2079151.pdf?src-supplier=Newark, ComponentLink5URL=http://www.farnell.com/datasheets/2079151.pdf?src-supplier=Newark, Height=0.5mm, Item Type=Capacitor, Lead Free="Lead Free", Length=0.039inch, Manufacturer Part Number=GRM155R62A104KE14D, Mount="Surface Mount", Packaging="Tape and Reel", Pricing 1="10000=0.00500, 20000=0.00410, 30000=0.00390, 50000=0.00370, 100000=0.00300 (USD)", Reach SVHC Compliant=Yes, RoHS=Yes, RoHS Compliant=Yes, Series=GRM, Stock 1=870000, Supplier 1="Arrow Electronics", Supplier Part Number 1=GRM155R62A104KE14D, Termination=SMD/SMT, Thickness=0.022inch, Voltage Rating (DC)=100V, Weight=0.000212oz, Width=0.02inch
C3 C19: library part CC0402KRX7R9BB103, "CAP CER 10000PF 50V X7R 0402", Case Code (Imperial)=0402, Case Code (Metric)=1005, Dielectric=X7R, LCSC Part Number=C60133, Manufacturer=Yageo, Max Operating Temperature=125°C, Min Operating Temperature=-55°C, Package Quantity=1, Resistor Type=Ceramic, Tolerance=10%, Voltage=50V, Capacitance=10nF, Case/Package=0402, Category="Ceramic Capacitors", ComponentLink1Description=https://datasheet.ciiva.com/11788/0900766b8079c870-11788375.pdf?src-supplier=RSComponents, ComponentLink1URL=https://datasheet.ciiva.com/11788/0900766b8079c870-11788375.pdf?src-supplier=RSComponents, ComponentLink2Description=https://datasheet.ciiva.com/26862/getdatasheetpartid-138248-26862642.pdf?src-supplier=Verical, ComponentLink2URL=https://datasheet.ciiva.com/26862/getdatasheetpartid-138248-26862642.pdf?src-supplier=Verical, ComponentLink3Description=https://datasheet.ciiva.com/7978/1489800-7978093.pdf?src-supplier=Element14, ComponentLink3URL=https://datasheet.ciiva.com/7978/1489800-7978093.pdf?src-supplier=Element14, ComponentLink4Description=https://datasheet.ciiva.com/28450/1489800-28450377.pdf?src-supplier=Element14, ComponentLink4URL=https://datasheet.ciiva.com/28450/1489800-28450377.pdf?src-supplier=Element14, ComponentLink5Description=https://datasheet.ciiva.com/176/mlccorderingcode-176349.pdf?src-supplier=Digi-Key, ComponentLink5URL=https://datasheet.ciiva.com/176/mlccorderingcode-176349.pdf?src-supplier=Digi-Key, ComponentLink6Description=https://datasheet.ciiva.com/176/mlccorderingcode-176348.pdf?src-supplier=Digi-Key, ComponentLink6URL=https://datasheet.ciiva.com/176/mlccorderingcode-176348.pdf?src-supplier=Digi-Key, ComponentLink7Description=https://datasheet.ciiva.com/176/mlccorderingcode-176350.pdf?src-supplier=Digi-Key, ComponentLink7URL=https://datasheet.ciiva.com/176/mlccorderingcode-176350.pdf?src-supplier=Digi-Key, Depth=0.5mm, Halogen Free="Halogen Free", Height=0.5mm, Item Type=Capacitor, Lead Free="Lead Free", Length=1mm, Manufacturer Part Number=CC0402KRX7R9BB103, Mount="Surface Mount", Packaging="Tape and Reel", Pricing 1="10000=0.00178 (USD)", Radiation Hardening=No, Reach SVHC Compliant=Yes, RoHS=Yes, RoHS Compliant=Yes, Series=CC, Stock 1=995000, Supplier 1=Avnet, Supplier Part Number 1=CC0402KRX7R9BB103, Termination=SMD/SMT, Thickness=0.022inch, Voltage Rating=50V, Voltage Rating (DC)=50V, Width=0.02inch
C4 C5 C6: library part RVT1H680M0607, "68uF 50V SMD,D6.3xL7.7mm Aluminum Electrolytic Capacitors - SMD ROHS", LCSC Part Number=C5221836, Manufacturer=ROQANG, Package=SMD,D6.3xL7.7mm, ComponentLink1Description=LCSC, ComponentLink1URL=https://www.lcsc.com/product-detail/Aluminum-Electrolytic-Capacitors-SMD_ROQANG-RVT1H680M0607_C5221836.html, Item Type=Capacitor, Manufacturer Part Number=RVT1H680M0607
C7 C8: library part TAJD227K010RNJ, "CAP TANT 220UF 10% 10V 2917", LCSC Part Number=C8024, Manufacturer="Kyocera AVX", Supplier Part Number=1349925, Category="Tantalum Capacitors", ComponentLink1Description=https://datasheet.ciiva.com/11793/0900766b80ccdc61-11793083.pdf?src-supplier=Rs, ComponentLink1URL=https://datasheet.ciiva.com/11793/0900766b80ccdc61-11793083.pdf?src-supplier=Rs, ComponentLink2Description=https://datasheet.ciiva.com/3004/taj-3004530.pdf?src-supplier=Avnet, ComponentLink2URL=https://datasheet.ciiva.com/3004/taj-3004530.pdf?src-supplier=Avnet, ComponentLink3Description=https://datasheet.ciiva.com/3004/taj-3004531.pdf?src-supplier=Avnet, ComponentLink3URL=https://datasheet.ciiva.com/3004/taj-3004531.pdf?src-supplier=Avnet, ComponentLink4Description=https://datasheet.ciiva.com/264/taj-264391.pdf?src-supplier=Digi-Key, ComponentLink4URL=https://datasheet.ciiva.com/264/taj-264391.pdf?src-supplier=Digi-Key, ComponentLink5Description=https://datasheet.ciiva.com/264/taj-264392.pdf?src-supplier=Digi-Key, ComponentLink5URL=https://datasheet.ciiva.com/264/taj-264392.pdf?src-supplier=Digi-Key, ComponentLink6Description=https://datasheet.ciiva.com/264/taj-264393.pdf?src-supplier=Digi-Key, ComponentLink6URL=https://datasheet.ciiva.com/264/taj-264393.pdf?src-supplier=Digi-Key, ComponentLink7Description=https://datasheet.ciiva.com/15163/getdatasheetpartid-121064-15163429.pdf?src-supplier=Verical, ComponentLink7URL=https://datasheet.ciiva.com/15163/getdatasheetpartid-121064-15163429.pdf?src-supplier=Verical, ComponentLink8Description=https://datasheet.ciiva.com/16201/taj-16201535.pdf?src-supplier=Future+Electronics, ComponentLink8URL=https://datasheet.ciiva.com/16201/taj-16201535.pdf?src-supplier=Future+Electronics, Item Type=Capacitor, Manufacturer Part Number=TAJD227K010RNJ, Pricing="500=0.553, 2500=0.537, 5000=0.523 (GBP)", RoHS=Yes, Stock=100, Supplier=Rs
C11: library part CA45-A-10V-10uF-K, "10uF 10V 8Ω@100kHz ±10% CASE-A-3216 Tantalum Capacitors ROHS", LCSC Part Number=C128253, Manufacturer="CEC(Shenzhen Zhenhua XinYun Elec)", Package=CASE-A-3216, ComponentLink1Description=LCSC, ComponentLink1URL=https://www.lcsc.com/product-detail/Tantalum-Capacitors_CEC-Shenzhen-Zhenhua-XinYun-Elec-CA45-A-10V-10uF-K_C128253.html, Item Type=Capacitor, Manufacturer Part Number=CA45-A-10V-10uF-K
C12: library part CA45-A-6.3V-47uF-K, "47uF 6.3V 5Ω@100kHz ±10% CASE-A-3216 Tantalum Capacitors ROHS", LCSC Part Number=C129570, Manufacturer=CEC, Package=CASE-A-3216, ComponentLink1Description=LCSC, ComponentLink1URL=https://www.lcsc.com/product-detail/Tantalum-Capacitors_CEC-Shenzhen-Zhenhua-XinYun-Elec-CA45-A-6-3V-47uF-K_C129570.html, Item Type=Capacitor, Manufacturer Part Number=CA45-A-6.3V-47uF-K